# Allegro board BEAGLEV-AHEAD_V11_no_logo.brd
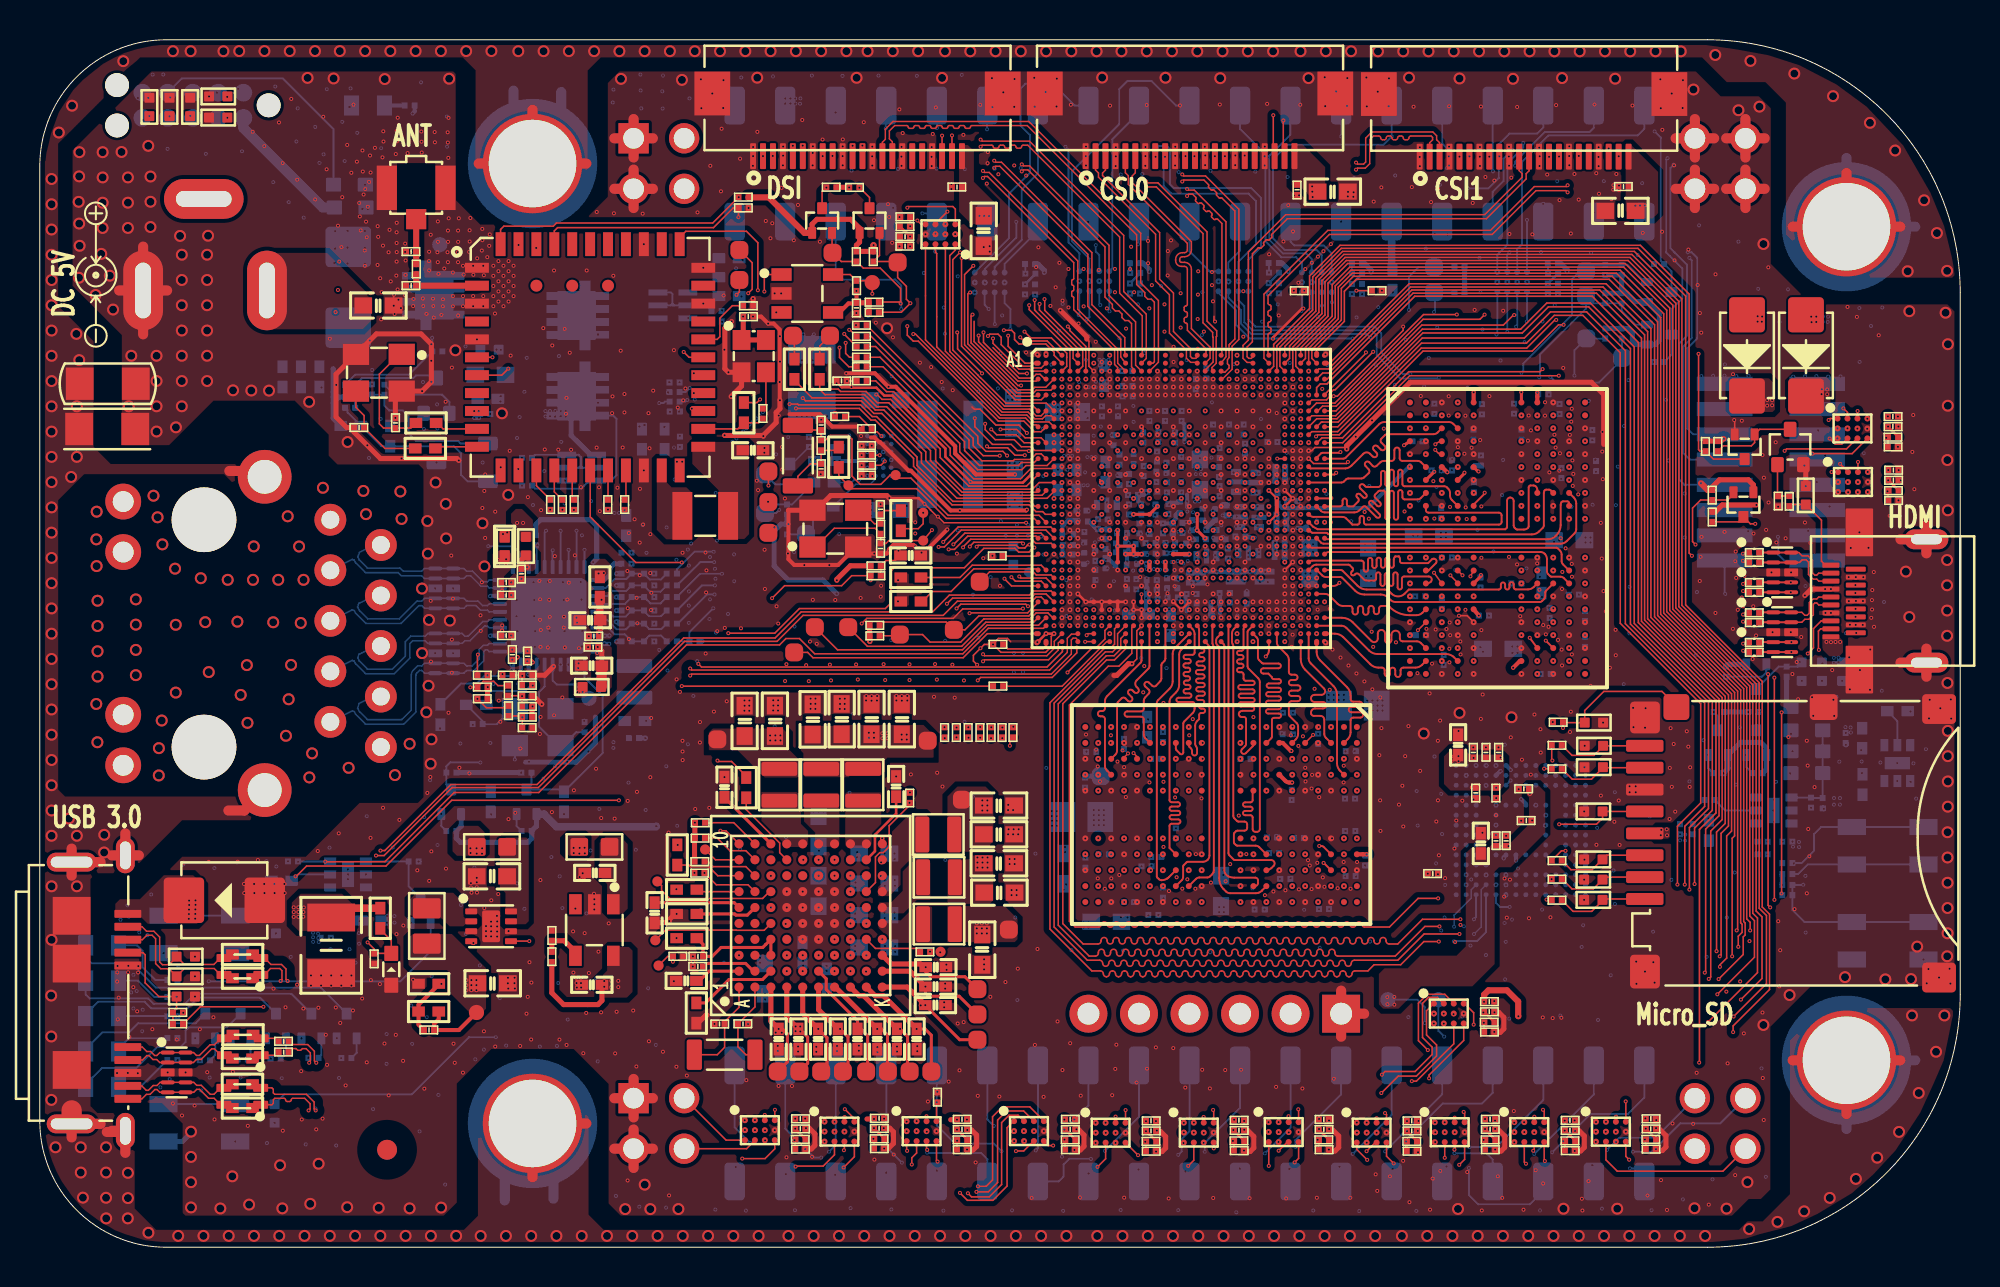
[diagram p0: board, top side]
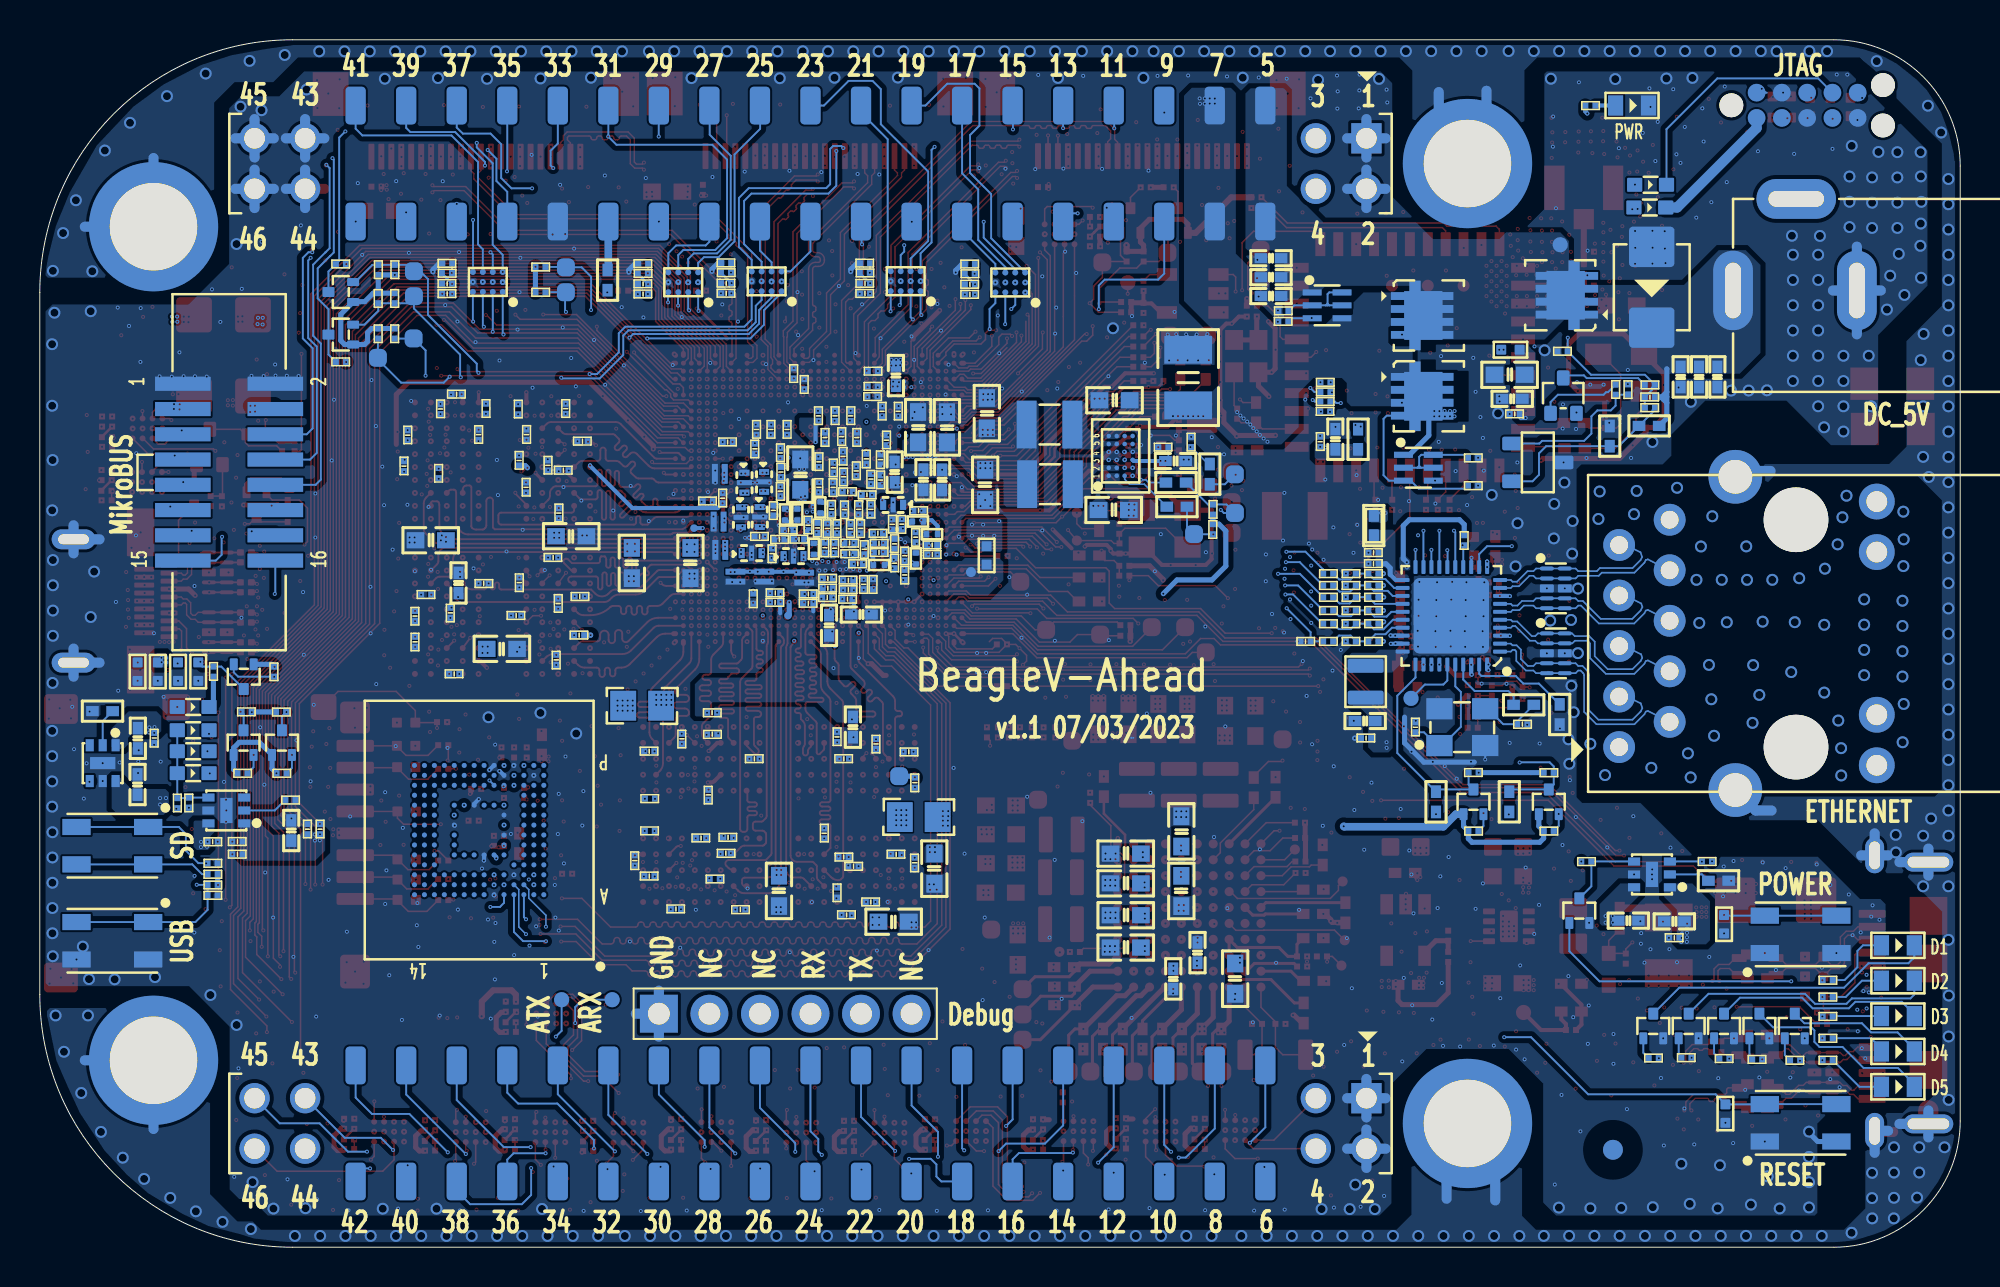
[diagram p1: board, bottom side, seen from below]

Outline 96.52 x 60.71 mm; copper layers: TOP, L2_GND, L3_SIG, L4_GND, L5_SIG, L6_PWR, L7_PWR, L8_PWR, L9_GND, BOTTOM. Coordinates in mm from the lower left corner of the outline.
Outline path: 0,54.36 0,6.35 arc(1.86,1.86) 6.35,0 83.82,0 arc(92.8,3.72) 96.52,12.7 96.52,48.01 arc(92.8,56.99) 83.82,60.71 6.35,60.71 arc(1.86,58.85) 0,54.36

## Design rules (mm)
constraint set DEFAULT: min track width 0.076, pair gap 0.127
net group EMMC0_CLK: nets EMMC0_CLK EMMC_CLK_S
net group GPIO4_08: nets GPIO4_08 N17026559
net group GPIO4_09: nets GPIO4_09 N17026498
net group GPIO4_10: nets GPIO4_10 N17026500
net group GPIO4_11: nets GPIO4_11 N17026502
net group GPIO4_12: nets GPIO4_12 N17026504
net group MDI0: nets MDI0+ MDI0-
net group MDI1: nets MDI1+ MDI1-
net group MDI2: nets MDI2+ MDI2-
net group MDI3: nets MDI3+ MDI3-
net group MICROB_DP: nets MICROB_DM MICROB_DP
net group MICROB_SSRXP: nets MICROB_SSRXM MICROB_SSRXP
net group MICROB_SSTXP: nets MICROB_SSTXM MICROB_SSTXP
net group MIPI_CSI2X2_B: nets MIPI_CSI2X2_B_CLKN MIPI_CSI2X2_B_CLKP
net group RGMII_RXCLK: nets RGMII_RXCLK RXC/PHYAD1
net group RGMII_RXD0: nets RGMII_RXD0 RXD0/RXDLY
net group RGMII_RXD1: nets RGMII_RXD1 RXD1/TXDLY
net group RGMII_RXD2: nets RGMII_RXD2 RXD2/PLLOFF
net group RGMII_RXD3: nets RGMII_RXD3 RXD3/PHYAD0
net group RGMII_RXDV: nets RGMII_RXDV RXCTL/PHYAD2
net group RGMII_TXCLK: nets RGMII_TXCLK TXC
net group RGMII_TXD0: nets RGMII_TXD0 TXD0
net group RGMII_TXD1: nets RGMII_TXD1 TXD1
net group RGMII_TXD2: nets RGMII_TXD2 TXD2
net group RGMII_TXD3: nets RGMII_TXD3 TXD3
net group RGMII_TXEN: nets RGMII_TXEN TXCTL
net group SDIO0_CLK: nets SD_CLK SDIO0_CLK
net group SDIO1_CLK: nets SDIO1_CLK SDIO1_CLK_R
net group SDIO1_CMD: nets N16794960 SDIO1_CMD
net group SDIO1_DAT0: nets N16794896 SDIO1_DAT0
net group SDIO1_DAT1: nets N16794893 SDIO1_DAT1
net group SDIO1_DAT2: nets N16794899 SDIO1_DAT2
net group SDIO1_DAT3: nets N16794902 SDIO1_DAT3
net group USB: nets USB_DM USB_DP
net group USB01: nets N16898160 N16898187
net group USB_RX: nets USB_RXM USB_RXP
net group USB_TX: nets USB_TXM USB_TXP
net group WIFI_XTAL_OUT: nets N16784971 WIFI_XTAL_OUT
net group DDR0_CA_CS_CK_CKE: nets EMI0_CA0 EMI0_CA1 EMI0_CA2 EMI0_CA3 EMI0_CA4 EMI0_CA5 EMI0_CK_C EMI0_CK_T EMI0_CKE0 EMI0_CKE1 EMI0_CS0 EMI0_CS1
net group DDR0_DQ0_DQS0_DMI0: nets EMI0_DMI0 EMI0_DQ0 EMI0_DQ1 EMI0_DQ2 EMI0_DQ3 EMI0_DQ4 EMI0_DQ5 EMI0_DQ6 EMI0_DQ7 EMI0_DQS0_C EMI0_DQS0_T
net group DDR0_DQ1_DQS1_DMI1: nets EMI0_DMI1 EMI0_DQ8 EMI0_DQ9 EMI0_DQ10 EMI0_DQ11 EMI0_DQ12 EMI0_DQ13 EMI0_DQ14 EMI0_DQ15 EMI0_DQS1_C EMI0_DQS1_T
net group DDR1_CA_CS_CK_CKE: nets EMI1_CA0 EMI1_CA1 EMI1_CA2 EMI1_CA3 EMI1_CA4 EMI1_CA5 EMI1_CK_C EMI1_CK_T EMI1_CKE0 EMI1_CKE1 EMI1_CS0 EMI1_CS1
net group DDR1_DQ0_DQS0_DMI0: nets EMI1_DMI0 EMI1_DQ0 EMI1_DQ1 EMI1_DQ2 EMI1_DQ3 EMI1_DQ4 EMI1_DQ5 EMI1_DQ6 EMI1_DQ7 EMI1_DQS0_C EMI1_DQS0_T
net group DDR1_DQ1_DQS1_DMI1: nets EMI1_DMI1 EMI1_DQ8 EMI1_DQ9 EMI1_DQ10 EMI1_DQ11 EMI1_DQ12 EMI1_DQ13 EMI1_DQ14 EMI1_DQ15 EMI1_DQS1_C EMI1_DQS1_T
net group DDR2_CA_CS_CK_CKE: nets EMI2_CA0 EMI2_CA1 EMI2_CA2 EMI2_CA3 EMI2_CA4 EMI2_CA5 EMI2_CK_C EMI2_CK_T EMI2_CKE0 EMI2_CKE1 EMI2_CS0 EMI2_CS1
net group DDR2_DQ0_DQS0_DMI0: nets EMI2_DMI0 EMI2_DQ0 EMI2_DQ1 EMI2_DQ2 EMI2_DQ3 EMI2_DQ4 EMI2_DQ5 EMI2_DQ6 EMI2_DQ7 EMI2_DQS0_C EMI2_DQS0_T
net group DDR2_DQ1_DQS1_DMI1: nets EMI2_DMI1 EMI2_DQ8 EMI2_DQ9 EMI2_DQ10 EMI2_DQ11 EMI2_DQ12 EMI2_DQ13 EMI2_DQ14 EMI2_DQ15 EMI2_DQS1_C EMI2_DQS1_T
net group DDR3_CA_CS_CK_CKE: nets EMI3_CA0 EMI3_CA1 EMI3_CA2 EMI3_CA3 EMI3_CA4 EMI3_CA5 EMI3_CK_C EMI3_CK_T EMI3_CKE0 EMI3_CKE1 EMI3_CS0 EMI3_CS1
net group DDR3_DQ0_DQS0_DMI0: nets EMI3_DMI0 EMI3_DQ0 EMI3_DQ1 EMI3_DQ2 EMI3_DQ3 EMI3_DQ4 EMI3_DQ5 EMI3_DQ6 EMI3_DQ7 EMI3_DQS0_C EMI3_DQS0_T
net group DDR3_DQ1_DQS1_DMI1: nets EMI3_DMI1 EMI3_DQ8 EMI3_DQ9 EMI3_DQ10 EMI3_DQ11 EMI3_DQ12 EMI3_DQ13 EMI3_DQ14 EMI3_DQ15 EMI3_DQS1_C EMI3_DQS1_T
net group EMMC: nets EMMC0/SD_RSTN
net group HDMI: nets HDMI_CLKN HDMI_CLKP HDMI_DATAN0 HDMI_DATAN1 HDMI_DATAN2 HDMI_DATAP0 HDMI_DATAP1 HDMI_DATAP2
net group MIPI_CSI2: nets MIPI_CSI2_DATAN0 MIPI_CSI2_DATAN1 MIPI_CSI2_DATAN2 MIPI_CSI2_DATAN3 MIPI_CSI2_DATAP0 MIPI_CSI2_DATAP1 MIPI_CSI2_DATAP2 MIPI_CSI2_DATAP3
net group MIPI_CSI2X2: nets MIPI_CSI2X2_A_CLKN MIPI_CSI2X2_A_CLKP MIPI_CSI2X2_A_DATAN0 MIPI_CSI2X2_A_DATAP0 MIPI_CSI2X2_B_DATAN0 MIPI_CSI2X2_B_DATAN1 MIPI_CSI2X2_B_DATAP0 MIPI_CSI2X2_B_DATAP1
net group MIPI_DSI1: nets MIPI_DSI1_CLKN MIPI_DSI1_CLKP MIPI_DSI1_DATAN0 MIPI_DSI1_DATAN1 MIPI_DSI1_DATAN2 MIPI_DSI1_DATAN3 MIPI_DSI1_DATAP0 MIPI_DSI1_DATAP1 MIPI_DSI1_DATAP2 MIPI_DSI1_DATAP3
net group SDIO0_CMD: nets SD_CMD SD_CMD_R SDIO0_CMD
net group SDIO0_DAT0: nets SD_DAT0 SD_DAT0_R SDIO0_DAT0
net group SDIO0_DAT1: nets SD_DAT1 SD_DAT1_R SDIO0_DAT1
net group SDIO0_DAT2: nets SD_DAT2 SD_DAT2_R SDIO0_DAT2
net group SDIO0_DAT3: nets SD_DAT3 SD_DAT3_R SDIO0_DAT3

## Placement (name value [footprint] x y rotation side)
C1  4.7uF  [C0402]  35.84 40.07 0 top
C2  4.7uF  [C0402]  22.52 42.66 0 bottom
C3  4.7uF  [C0402]  29.91 26.46 0 bottom
C4  100nF  [C0201]  22.39 41.89 0 bottom
C5  4.7uF  [C0402]  31.41 40.62 90 bottom
C6  100nF  [C0201]  32.17 40.5 90 bottom
C7  22pF  [C0201]  40.3 43.56 0 top
C8  10uF  [C0603]  22.72 18.65 180 top
C9  22pF  [C0201]  19.56 10.92 180 top
C10  22uF  [C0603]  22.76 13.27 0 top
C11  4.7uF  [C0402]  27.74 29.24 180 top
C12  100nF  [C0201]  27.81 30.17 180 top
C13  4.7uF  [C0402]  27.66 31.52 180 top
C14  100nF  [C0201]  35.61 46.79 0 top
C15  22pF  [C0201]  17.87 41.44 90 top
C16  18pF  [C0201]  16.05 41.21 180 top
C17  1pF  [C0201]  18.66 50.05 180 top
C18  1pF  [C0201]  18.66 48.34 180 top
C19  10uF  [C0603]  47.44 51.1 270 top
C20  100nF  [C0201]  27.85 30.72 180 top
C21  1uF  [C0201]  24.21 33.85 270 top
C22  100nF  [C0201]  23.75 29.79 90 top
C23  1uF  [C0201]  29.49 34.36 0 bottom
C24  100nF  [C0201]  29.49 34.92 0 bottom
C25  1uF  [C0201]  23.44 33.42 0 top
C26  100nF  [C0201]  23.44 30.76 0 top
C27  100nF  [C0201]  24.51 29.71 90 top
C28  100nF  [C0201]  23.44 32.79 0 top
C29  100nF  [C0201]  29.86 25.6 0 bottom
C30  1nF  [C1206]  3.42 43.41 180 top
C31  22pF  [C0201]  22.01 26.3 180 bottom
C32  22pF  [C0201]  27.39 26.14 90 bottom
C33  100nF  [C0201]  46.1 53.3 180 top
C34  1nF  [C0402]  43.77 34.78 0 top
C35  22pF  [C0201]  32.9 30.46 180 bottom
C36  10uF  [C0603]  79.44 52.11 180 top
C37  100nF  [C0201]  79.6 53.32 180 top
C38  100nF  [C0201]  53.56 34.39 90 bottom
C39  100nF  [C0201]  57.06 35.17 270 bottom
C40  100nF  [C0201]  53.19 36.35 270 bottom
C41  100nF  [C0201]  57.91 36.3 90 bottom
C42  100nF  [C0201]  56.94 32.67 180 bottom
C43  10uF  [C0603]  64.98 53.07 0 top
C44  100nF  [C0201]  55.93 32.59 180 bottom
C45  1uF  [C0201]  87.83 20.39 180 bottom
C46  1uF  [C0201]  86.59 20.39 0 bottom
C47  4.7uF  [C0402]  83.88 20.95 90 bottom
C48  100nF  [C0201]  83.07 21.02 90 bottom
C49  100nF  [C0201]  82.44 21.02 90 bottom
C50  100nF  [C0201]  73.19 20.43 90 top
C51  100nF  [C0201]  74.59 23.04 180 top
C52  100nF  [C0201]  73.7 20.43 90 top
C53  100nF  [C0201]  74.71 21.45 180 top
C54  4.7uF  [C0402]  72.43 20.3 90 top
C55  100nF  [C0201]  86.59 19.76 0 bottom
C56  100nF  [C0201]  72.17 22.84 270 top
C57  100nF  [C0201]  72.68 24.88 90 top
C58  100nF  [C0201]  72.05 24.88 90 top
C59  100nF  [C0201]  73.32 24.88 90 top
C60  4.7uF  [C0402]  71.28 25.26 90 top
C61  100nF  [C0201]  70.01 18.78 180 top
C62  100nF  [C0201]  63.19 53.16 270 top
C63  1uF  [C0402]  16.68 16.42 180 bottom
C64  1uF  [C0402]  91.59 25.59 270 bottom
C65  100nF  [C0201]  90.77 25.6 270 bottom
C66  100nF  [C0201]  12.26 10.35 180 top
C67  100nF  [C0201]  15.59 42.74 0 bottom
C68  100nF  [C0201]  12.26 9.81 180 top
C69  100uF  [C1210]  14.65 15.18 270 top
C70  1uF  [C0402]  91.61 23.26 90 bottom
C71  1uF  [C0402]  14.37 16.38 0 bottom
C72  100nF  [C0201]  14.37 15.56 0 bottom
C73  47uF  [C0603]  22.65 43.86 0 bottom
C74  100nF  [C0201]  68.96 5.85 0 top
C75  100nF  [C0201]  68.96 6.36 0 top
C76  100nF  [C0201]  76.91 5.88 0 top
C77  100nF  [C0201]  76.91 6.38 0 top
C78  100nF  [C0201]  64.54 5.93 0 top
C79  100nF  [C0201]  64.54 6.43 0 top
C80  100nF  [C0201]  55.85 5.85 0 top
C81  100nF  [C0201]  55.85 6.36 0 top
C82  100nF  [C0201]  42.18 5.98 0 top
C83  100nF  [C0201]  42.18 6.49 0 top
C84  100nF  [C0201]  93.14 41.26 0 top
C85  100nF  [C0201]  93.14 41.77 0 top
C86  100nF  [C0201]  72.85 11.84 0 top
C87  100nF  [C0201]  72.85 12.35 0 top
C88  100nF  [C0201]  55.05 48.46 0 bottom
C89  100nF  [C0201]  55.05 47.95 0 bottom
C90  100nF  [C0201]  93.16 38.57 0 top
C91  100nF  [C0201]  93.16 39.07 0 top
C92  100nF  [C0201]  76.05 48.44 0 bottom
C93  100nF  [C0201]  76.05 47.94 0 bottom
C94  100nF  [C0201]  41.05 47.23 270 top
C95  1uF  [C0402]  27.9 18.82 180 top
C96  1uF  [C0402]  27.75 13.2 180 top
C97  100nF  [C0201]  51.79 5.93 0 top
C98  100nF  [C0201]  51.79 6.43 0 top
C99  100nF  [C0201]  60.27 5.88 0 top
C100  100nF  [C0201]  60.27 6.38 0 top
C101  100nF  [C0201]  80.97 5.95 0 top
C102  100nF  [C0201]  80.97 6.46 0 top
C103  100nF  [C0201]  46.35 5.93 0 top
C104  100nF  [C0201]  46.35 6.43 0 top
C105  100nF  [C0201]  38.22 5.95 0 top
C106  100nF  [C0201]  38.22 6.46 0 top
C107  100nF  [C0201]  72.89 5.93 0 top
C108  100nF  [C0201]  72.89 6.43 0 top
C109  100nF  [C0201]  66.2 48.43 0 bottom
C110  100nF  [C0201]  66.2 47.92 0 bottom
C111  100nF  [C0201]  43.49 50.81 180 top
C112  100nF  [C0201]  43.49 50.33 180 top
C113  100nF  [C0201]  49.77 48.41 0 bottom
C114  100nF  [C0201]  49.77 47.9 0 bottom
C115  100nF  [C0201]  62.02 48.47 0 bottom
C116  100nF  [C0201]  62.02 47.96 0 bottom
C117  100pF  [C0402]  12.2 43.76 270 bottom
C118  220pF  [C0402]  13.13 43.76 270 bottom
C119  1nF  [C0402]  14.05 43.76 270 bottom
C120  220pF  [C0402]  34.64 49.73 0 bottom
C121  100pF  [C0402]  34.64 47.82 0 bottom
C122  1nF  [C0402]  34.64 48.77 0 bottom
C123  22uF  [C0603]  17.02 47.35 0 top
C169  22uF  [C0603]  76.87 35.54 0 bottom
C170  1uF  [C0201]  70.72 34.67 0 bottom
C171  1uF  [C0201]  72.41 33.42 270 bottom
C172  1uF  [C0201]  70.2 39.06 0 bottom
C173  1uF  [C0201]  69.38 32.72 180 bottom
C174  1uF  [C0201]  75.57 42.89 0 bottom
C176  100nF  [C0201]  72.58 31.76 0 bottom
C177  100nF  [C0201]  72.08 38.2 90 bottom
C178  10uF  [C0402]  75.48 33.4 90 bottom
C179  1uF  [C0201]  77.66 31.74 270 bottom
C180  1uF  [C0201]  78.22 39.27 90 bottom
C181  100nF  [C0201]  56.12 19.62 180 bottom
C257  1uF  [C0201]  74.21 33.37 180 bottom
C258  1uF  [C0201]  70.43 36.91 90 bottom
C259  1uF  [C0201]  75.69 28.82 0 bottom
C260  1uF  [C0201]  72.43 39.55 90 bottom
C261  1uF  [C0201]  70.98 39.31 90 bottom
C262  1uF  [C0201]  53.48 19.75 0 bottom
C267  22uF  [C0603]  53.61 16.37 180 bottom
C268  1uF  [C0201]  52.85 24.91 180 bottom
C269  1uF  [C0201]  65.88 18.66 0 bottom
C270  1uF  [C0201]  56.11 24.56 0 bottom
C271  1uF  [C0201]  64.25 25.56 270 bottom
C272  1uF  [C0201]  64.55 17 0 bottom
C273  1uF  [C0201]  65.89 24.94 0 bottom
C274  1uF  [C0201]  54.49 25.3 270 bottom
C275  100nF  [C0201]  54.75 17.36 0 bottom
C276  100nF  [C0201]  55.62 19.16 180 bottom
C277  100nF  [C0201]  62.73 26.87 180 bottom
C278  1uF  [C0201]  55.97 16.71 0 bottom
C281  1uF  [C0201]  62.92 22.74 270 bottom
C282  1uF  [C0201]  52.54 23.36 270 bottom
C283  1uF  [C0201]  61.31 16.98 180 bottom
C284  1uF  [C0201]  62.72 25.79 180 bottom
C285  100nF  [C0201]  66.61 19.44 270 bottom
C286  100nF  [C0201]  61.93 20.6 0 bottom
C287  10uF  [C0402]  55.65 26.15 270 bottom
C288  1uF  [C0201]  62.04 19.81 180 bottom
C289  1uF  [C0201]  72.06 40.85 90 bottom
C290  1uF  [C0201]  74.47 40.85 90 bottom
C333  22pF  [C0201]  39.27 41.34 270 top
C336  22pF  [C0201]  39.27 39.13 90 top
C337  18pF  [C0201]  42.25 35.13 90 top
C338  18pF  [C0201]  42.25 37.1 270 top
C373  1uF  [C0201]  59.27 38.98 270 bottom
C374  1uF  [C0201]  59.3 38.01 270 bottom
C375  1uF  [C0201]  54.75 38.62 270 bottom
C457  1uF  [C0201]  51.67 35.3 0 bottom
C458  10nF  [C0201]  51.66 34.83 0 bottom
C600  22uF  [C0603]  39.15 17.91 270 bottom
C601  47uF  [C0603]  41.8 26.55 90 top
C602  47uF  [C0603]  43.32 26.55 90 top
C603  22uF  [C0603]  41.94 15.07 0 bottom
C604  22uF  [C0603]  41.94 16.69 0 bottom
C605  22uF  [C0603]  41.94 18.29 0 bottom
C606  47uF  [C0603]  40.3 26.55 90 top
C607  22uF  [C0603]  36.44 13.5 270 bottom
C608  2.2uF  [C0402]  39.55 13.49 270 bottom
C609  22uF  [C0603]  39.15 20.91 90 bottom
C610  22uF  [C0603]  41.94 19.79 0 bottom
C611  2.2uF  [C0402]  38.33 14.81 90 bottom
C612  47uF  [C0603]  36.95 26.47 90 top
C613  47uF  [C0603]  35.42 26.46 90 top
C614  2.2uF  [C0402]  45.03 14.08 0 top
C615  2.2uF  [C0402]  45.02 13.1 0 top
C616  2.2uF  [C0402]  45.01 12.17 0 top
C617  2.2uF  [C0402]  44.07 10.47 270 top
C618  2.2uF  [C0402]  43.08 10.47 270 top
C619  2.2uF  [C0402]  42.09 10.47 270 top
C620  47uF  [C0603]  48.21 19.3 0 top
C621  47uF  [C0603]  48.23 17.83 0 top
C622  2.2uF  [C0402]  41.1 10.47 270 top
C623  2.2uF  [C0402]  40.11 10.47 270 top
C624  2.2uF  [C0402]  39.12 10.47 270 top
C625  2.2uF  [C0402]  30.9 16.82 270 top
C626  2.2uF  [C0402]  38.13 10.47 270 top
C627  2.2uF  [C0402]  37.14 10.47 270 top
C628  47uF  [C0603]  47.37 14.96 270 top
C629  47uF  [C0603]  48.92 41.93 90 bottom
C630  47uF  [C0603]  49.01 38.33 270 bottom
C631  100uF  [C1210]  38.8 43.72 90 bottom
C632  22uF  [C0603]  42.55 37.07 0 bottom
C633  22uF  [C0603]  42.5 42.58 0 bottom
C634  22pF  [C0201]  34.16 11.23 0 top
C638  1uF  [C0402]  39.44 39.53 180 bottom
C639  22pF  [C0201]  35.34 11.23 180 top
C640  1uF  [C0201]  33.08 14.62 180 top
C641  220nF  [C0201]  33.07 14.11 180 top
C642  470nF  [C0402]  32.49 13.39 180 top
C643  47nF  [C0402]  34.41 23.13 90 top
C644  470nF  [C0402]  43.04 23.16 90 top
C673  47uF  [C0603]  38.84 26.54 90 top
C687  47uF  [C0603]  48.21 22.21 0 top
C698  47uF  [C0603]  48.21 20.76 0 top
C1000  22uF  [C0603]  73.3 30.08 180 bottom
C1001  1uF  [C0201]  70.47 32.36 90 bottom
C1002  1uF  [C0201]  69.41 30.77 0 bottom
C1003  1uF  [C0201]  75.89 31.89 270 bottom
C1004  1uF  [C0201]  70.56 29.53 270 bottom
C1005  1uF  [C0201]  77.66 30.44 270 bottom
C1006  1uF  [C0201]  76.38 42.14 90 bottom
C1007  1uF  [C0201]  78.03 40.83 90 bottom
C1008  100nF  [C0201]  69.24 40.52 0 bottom
C1009  100nF  [C0201]  70.09 42.16 90 bottom
C1010  22uF  [C0603]  59.37 17.91 270 bottom
C1011  1uF  [C0201]  60.6 24.56 0 bottom
C1012  1uF  [C0201]  57.1 20.81 90 bottom
C1013  1uF  [C0201]  56.45 25.66 90 bottom
C1014  1uF  [C0201]  52.55 19.33 270 bottom
C1015  1uF  [C0201]  63.29 20.57 0 bottom
C1020  1uF  [C0201]  59.3 39.93 90 bottom
C1021  1uF  [C0201]  59.65 37.04 270 bottom
C1023  1uF  [C0201]  56.72 37.11 270 bottom
C1024  1uF  [C0201]  56.15 39.76 90 bottom
C1026  100nF  [C0201]  55.82 35.41 180 bottom
C1027  100nF  [C0201]  57.36 38.21 270 bottom
C1028  1uF  [C0201]  54.27 38.57 90 bottom
C1029  1uF  [C0201]  54.75 37.1 90 bottom
C1030  1uF  [C0201]  56.07 37.09 270 bottom
C1031  1uF  [C0201]  55.49 39.03 90 bottom
C1034  10uF  [C0402]  53.55 38.97 90 bottom
C1035  10uF  [C0402]  51.17 38.58 90 bottom
C1036  10uF  [C0402]  52.11 38.58 90 bottom
C1037  47uF  [C0603]  58.3 38.85 90 bottom
C1038  47uF  [C0603]  52.38 41.23 90 bottom
C1039  47uF  [C0603]  50.93 41.22 90 bottom
C1040  1uF  [C0201]  56.65 38.2 270 bottom
C1041  1uF  [C0201]  57.36 39.49 90 bottom
C1042  1uF  [C0201]  56.63 39.19 270 bottom
C1043  1uF  [C0201]  56.12 38.74 270 bottom
C1044  1uF  [C0201]  54.27 39.6 270 bottom
C1045  1uF  [C0201]  54.98 39.64 270 bottom
C1046  1uF  [C0201]  55.36 37.1 270 bottom
C1047  1uF  [C0201]  54.95 37.83 180 bottom
C1048  1uF  [C0201]  55.91 37.98 0 bottom
C1051  100nF  [C0201]  57.39 41.8 90 bottom
C1052  1uF  [C0201]  56.55 41.8 90 bottom
C1053  1uF  [C0201]  55.76 41.8 90 bottom
C1055  1uF  [C0201]  55.46 40.7 90 bottom
C1056  1uF  [C0201]  57.06 40.7 90 bottom
C1057  100nF  [C0201]  56.22 40.75 90 bottom
C1059  1uF  [C0201]  55.08 35.09 270 bottom
C1060  1uF  [C0201]  55.41 34.36 0 bottom
C1062  100nF  [C0201]  55.78 36.12 90 bottom
C1066  1uF  [C0201]  55.11 33.33 270 bottom
C1067  10uF  [C0402]  53.49 43.82 90 bottom
C1068  1uF  [C0201]  61.94 40.48 0 bottom
C1069  1uF  [C0201]  54.19 42.03 90 bottom
C1070  1uF  [C0201]  60.5 41.11 90 bottom
C1071  1uF  [C0201]  53.38 42.03 90 bottom
C1072  1uF  [C0201]  59.78 41.11 90 bottom
C1073  100nF  [C0201]  53.97 40.58 90 bottom
C1074  100nF  [C0201]  58.97 41.11 90 bottom
C1075  10uF  [C0402]  56.85 31.27 270 bottom
C1076  1uF  [C0201]  56.91 33.63 0 bottom
C1077  1uF  [C0201]  56.91 33.13 0 bottom
C1083  1uF  [C0201]  52.36 37.03 180 bottom
C1084  100nF  [C0201]  53.05 33.8 270 bottom
C1085  10uF  [C0402]  55.23 31.81 180 bottom
C1086  1uF  [C0201]  55.89 33.05 0 bottom
C1087  1uF  [C0201]  55.89 33.54 0 bottom
C1091  1uF  [C0201]  54.4 35.9 180 bottom
C1092  1uF  [C0201]  54.34 34.93 180 bottom
C1093  100nF  [C0201]  54.34 35.39 180 bottom
C1095  1uF  [C0201]  53.57 35.36 90 bottom
C1097  1uF  [C0201]  56.94 36.14 270 bottom
C1098  100nF  [C0201]  56.45 36.14 270 bottom
C1100  1uF  [C0201]  60.58 40.15 270 bottom
C1101  1uF  [C0201]  57.43 36.17 270 bottom
C1103  1uF  [C0201]  55.26 36.14 270 bottom
C1106  1uF  [C0201]  55.83 34.87 180 bottom
C1109  100nF  [C0201]  58.89 36.06 0 bottom
C1110  1uF  [C0201]  52.5 35.7 270 bottom
C1111  1uF  [C0201]  53.67 36.34 90 bottom
C1114  1uF  [C0201]  53.05 34.77 270 bottom
C1115  4.3uF  [EMIFIL_0402_3P]  61.28 36.7 270 bottom
C1116  4.3uF  [EMIFIL_0402_3P]  60.74 34.9 180 bottom
C1117  4.3uF  [EMIFIL_0402_3P]  58.64 34.75 180 bottom
C1118  4.3uF  [EMIFIL_0402_3P]  61.11 38.44 270 bottom
C1119  22uF  [C0603]  69.81 35.75 180 bottom
C1120  22uF  [C0603]  51.56 19.03 270 bottom
C1122  1uF  [C0204]  60.11 33.71 270 bottom
C1123  1uF  [C0204]  61.56 33.71 270 bottom
C1124  1uF  [C0204]  58.1 33.66 270 bottom
C1125  1uF  [C0204]  62.34 38.88 0 bottom
C1127  1uF  [C0204]  62.32 35.06 0 bottom
C1128  1uF  [C0204]  62.4 36.48 0 bottom
C1129  22uF  [C0603]  63.82 34.4 270 bottom
C1130  22uF  [C0603]  66.76 34.4 270 bottom
C1133  4.3uF  [EMIFIL_0402_3P]  60.12 38.48 270 bottom
C1134  4.3uF  [EMIFIL_0402_3P]  60.34 36.71 270 bottom
C1135  1uF  [C0201]  59.71 34.88 270 bottom
C1136  1uF  [C0201]  58.36 35.59 0 bottom
C1137  1uF  [C0201]  60.34 35.73 0 bottom
C1138  1uF  [C0201]  59.35 35.59 180 bottom
C1140  100nF  [C0201]  59.56 32.42 0 bottom
C1141  1uF  [C0201]  57.9 32.37 0 bottom
C1142  1uF  [C0201]  59.56 32.89 0 bottom
C1144  1uF  [C0201]  62.2 37.66 90 bottom
C1147  1uF  [C0201]  57.89 32.84 0 bottom
C1150  1uF  [C0201]  56.57 35.14 90 bottom
C1151  22nF  [EMIFIL_0402_3P]  53.63 37.32 0 bottom
D1  TPD4E05U06DQAR  [USON10_0D5_2D5X1X0D5MM]  20.32 33.12 270 bottom
D2  TPD4E05U06DQAR  [USON10_0D5_2D5X1X0D5MM]  20.32 29.86 270 bottom
D3  RB520S30T1G  [SOD_523]  88.81 27.16 180 bottom
D4  TPD4E05U06DQAR  [USON10_0D5_2D5X1X0D5MM]  87.57 33.93 270 top
D5  TPD4E05U06DQAR  [USON10_0D5_2D5X1X0D5MM]  87.57 30.92 270 top
D6  ESDPSA0402V05  [D0402]  88.56 28.94 90 bottom
D7  ESDPSA0402V05  [D0402]  89.57 28.94 90 bottom
D8  ESDPSA0402V05  [D0402]  91.6 28.94 90 bottom
D9  RB520S30T1G  [SOD_523]  88.81 23.83 180 bottom
D10  ESDPSA0402V05  [D0402]  90.59 28.94 90 bottom
D11  ESDPSA0402V05  [D0402]  88.76 37.8 270 top
D12  TPD4E02B04DQAR  [USON10_0D5_2D5X1X0D5MM]  6.88 8.79 270 top
D13  RB520S30T1G  [SOD_523]  88.81 25.99 180 bottom
D14  TPD1E1B04DPYR  [D0402]  78.11 26.38 180 top
D15  TPD1E1B04DPYR  [D0402]  78.08 17.46 0 top
D16  TPD1E1B04DPYR  [D0402]  78.08 18.48 0 top
D17  TPD1E1B04DPYR  [D0402]  78.08 19.5 0 top
D18  TPD1E1B04DPYR  [D0402]  78.08 21.91 0 top
D19  ESDPSA0402V05  [D0402]  7.34 14.61 180 top
D20  ESDPSA0402V05  [D0402]  7.34 13.62 180 top
D21  ESDPSA0402V05  [D0402]  7.34 12.6 180 top
D22  SMBJ5.0CA-TR  [DO_214AA_SMB]  9.28 17.44 180 top
D23  MM5Z3V3T1G  [SOD_523]  17.67 13.97 90 top
D24  B130L-13-F  [DO_214AC_SMA]  85.8 44.84 270 top
D25  SMBJ24CA  [DO_214AA_SMB]  15.5 48.26 270 bottom
D26  TPD1E1B04DPYR  [D0402]  78.1 24.14 0 top
D27  TPD1E1B04DPYR  [D0402]  78.11 25.21 0 top
D28  B130L-13-F  [DO_214AC_SMA]  88.77 44.84 270 top
D29  TPD1E1B04DPY  [D0402]  8.97 57.86 0 top
D30  TPD1E1B04DPY  [D0402]  7.56 57.33 270 top
D31  TPD1E1B04DPY  [D0402]  5.51 57.33 270 top
D32  RB520S30T1G  [SOD_523]  15.56 53.42 180 bottom
D33  TPD1E1B04DPY  [D0402]  8.97 56.8 0 top
D34  TPD1E1B04DPY  [D0402]  6.52 57.33 270 top
D35  RB520S30T1G  [SOD_523]  15.6 52.27 180 bottom
D36  ESDPSA0402V05  [D0402]  11.8 6.72 90 bottom
D37  ESDPSA0402V05  [D0402]  11.87 16.24 90 bottom
D38  RB520S30T1G  [SOD_523]  88.81 24.94 180 bottom
FB1  120R  [L0603]  22.73 20.13 0 top
FB2  120R  [L0402]  27.74 28.17 0 top
FB3  120R  [L0402]  24.43 35.25 90 top
FB4  120R  [L0402]  23.37 35.23 90 top
FB5  600R  [L0201]  52.49 34.63 270 bottom
FB6  600R  [L0201]  52.39 36.48 180 bottom
FB7  600R  [L0201]  51.68 35.85 180 bottom
FB8  600R  [L0201]  54.34 34.3 180 bottom
FB9  600R  [L0201]  57.29 37.19 270 bottom
FB10  600R  [L0201]  58.45 36.84 90 bottom
FB11  600R  [L0201]  59.07 36.84 90 bottom
FB12  600R  [L0201]  57.62 35.11 90 bottom
FB13  120R  [L0402]  48.93 34.78 270 bottom
FB14  120R  [L0402]  29.47 36.28 270 bottom
FB15  120R  [L0402]  22.6 45.12 180 bottom
FB16  120R  [L0603]  27.87 20.13 0 top
J1  10118241-001RLF  [HDMI23P_0D4_7D5X6D5X2D9MM]  90.02 32.49 180 top
J2  U.FL-R-SMT-1(10)  [U-FL3P-SMD-2_6X2_6X1_0MM]  18.92 53.26 270 top
J3  FPC 22P 0.5mm  [FPC22_0D5_15_4X5_25X2MM_0D5_DX_NPWB]  41.1 55.16 180 top
J4  FPC 22P 0.5mm  [FPC22_0D5_15_4X5_25X2MM_0D5_DX_NPWB]  74.6 55.13 180 top
J5  FPC 22P 0.5mm  [FPC22_0D5_15_4X5_25X2MM_0D5_DX_NPWB]  57.81 55.16 180 top
J6  Micro USB 3.0 Type B  [USB_MTCONN_UBF30-0101]  1.6 15.46 270 top
J7  Header 2x8 1.27mm  [HEADER2X8_SMD_1D27]  87.01 38.97 90 bottom
J8  DC-005  [DC_JACK_DC_005_14_2X11X9MM]  8.24 47.75 0 bottom
J9  TC2050-IDC  [CONNECT10_1D27_12_4X6_7MM]  7.69 57.41 180 bottom
J10  Header 1x6 2.54mm  [HEADER6P_2D54_DIP]  65.41 11.74 90 bottom
J14  LPJG0933H11NL  [RJ45_18P_LPJG0801HBNL]  8.25 30.86 90 bottom
J15  YL004-030-001  [MICRO_SD_15X14_3X1_8MM]  80.68 26.31 270 top
L1  4.7uH  [L2520]  33.45 36.77 0 top
L2  0.47uH  [L0805]  19.45 16.15 270 top
L3  2.2uH  [L2016]  29.88 28.43 270 bottom
L4  90R  [L2012]  10.18 14.11 180 top
L5  90R  [L2012]  10.2 10.08 180 top
L6  90R  [L2012]  10.18 7.59 180 top
L7  90R  [L4P_0_85X0_65MM]  86.16 30.16 270 top
L8  90R  [L4P_0_85X0_65MM]  86.16 31.66 270 top
L9  90R  [L4P_0_85X0_65MM]  86.16 33.18 270 top
L10  90R  [L4P_0_85X0_65MM]  86.16 34.68 270 top
L36  1uH  [L2016]  41.38 23.25 90 top
L37  1uH  [L2016]  39.28 23.25 90 top
L38  1uH  [L2016]  37.17 23.25 90 top
L39  1uH  [L2016]  45.19 18.6 0 top
L40  1uH  [L2016]  45.19 16.24 0 top
L41  0.16uH  [L2520]  45.75 38.36 0 bottom
L42  0.16uH  [L2520]  45.77 41.36 0 bottom
L43  1uH  [L2016]  45.16 20.75 0 top
LED1  Blue  [LED0603]  3.13 15.18 180 bottom
LED2  Blue  [LED0603]  3.13 13.4 180 bottom
LED3  Blue  [LED0603]  3.13 11.62 180 bottom
LED4  Blue  [LED0603]  3.13 9.84 180 bottom
LED5  Blue  [LED0603]  3.13 8.07 180 bottom
LED6  Green  [LED0603]  16.5 57.4 180 bottom
MH1  SMD Stud M3  [PTH_4_45MM_6D5]  24.77 54.48 180 bottom
MH2  SMD Stud M3  [PTH_4_45MM_6D5]  24.77 6.22 180 bottom
MH3  SMD Stud M3  [PTH_4_45MM_6D5]  90.81 9.4 180 bottom
MH4  SMD Stud M3  [PTH_4_45MM_6D5]  90.81 51.31 180 bottom
NOREF  -  []  6.39 0.01 90 top
NOREF#2  U*  [unnamed#2]  17.45 4.9 0 top
NOREF#3  -  []  0 54.36 0 top
NOREF#4  U*  [unnamed#2]  17.45 4.9 180 bottom
OSC1  32.768kHz  [X4-SMD-2_5X2_0X1_0MM]  35.88 44.8 270 top
P8  Header 2x23 2.54mm  [HEADER2X23P_2D54_SMD_PTH]  57.78 6.22 0 bottom
P9  Header 2x23 2.54mm  [HEADER2X23P_2D54_SMD_PTH]  57.78 54.48 0 bottom
Q1  DMG1012T-7  [SOT_523]  20.68 22.39 0 bottom
Q2  DMG1012T-7  [SOT_523]  24.46 22.39 0 bottom
Q3  DMG1012T-7  [SOT_523]  41.7 51.62 180 top
Q4  CJ2101  [SOT323]  19.95 42.82 180 bottom
Q7  DMG1012T-7  [SOT_523]  39.32 51.62 180 top
Q8  DMG1012T-7  [SOT_523]  84.35 25.37 0 bottom
Q9  DMG1012T-7  [SOT_523]  86.28 25.37 0 bottom
Q10  DMG1012T-7  [SOT_523]  86.27 28.69 180 bottom
Q11  BC817W  [SOT323]  87.97 40.23 0 top
Q12  DMG1012T-7  [SOT_523]  85.69 40.25 0 top
Q13  DMG1012T-7  [SOT_523]  19.14 16.92 0 bottom
Q14  DMG1012T-7  [SOT_523]  81.39 48.02 270 bottom
Q15  RQ3E120ATTB  [DFN08_SON08_0D66_3X3MM]  20.1 47.86 0 bottom
Q16  DMG1012T-7  [SOT_523]  81.39 45.88 270 bottom
Q17  DMG1012T-7  [SOT_523]  15.43 11.12 0 bottom
Q18  DMG1012T-7  [SOT_523]  13.65 11.12 0 bottom
Q19  DMG1012T-7  [SOT_523]  11.87 11.12 0 bottom
Q20  DMG1012T-7  [SOT_523]  8.31 11.12 0 bottom
Q21  RQ3E120ATTB  [DFN08_SON08_0D66_3X3MM]  26.71 46.85 180 bottom
Q22  RQ3E120ATTB  [DFN08_SON08_0D66_3X3MM]  26.71 42.78 180 bottom
Q23  BCM857BS-7-F  [SMINI6-F3-B]  31.82 47.35 90 bottom
Q24  BCM857BS-7-F  [SMINI6-F3-B]  27.23 39.19 90 bottom
Q26  DMG1012T-7  [SOT_523]  10.09 11.12 0 bottom
Q27  DMG1012T-7  [SOT_523]  85.63 37.34 0 top
R1  0R  [R0402]  30.26 40.62 90 bottom
R2  0R  [R0402]  35.39 41.96 90 top
R3  240R  [R0201]  72.48 42.13 90 bottom
R4  240R  [R0201]  74.1 42.16 90 bottom
R5  33R  [R0201]  36.34 41.91 90 top
R6  0R  [R0402]  19.38 40.16 180 top
R7  100R  [R0402]  19.41 41.44 180 top
R8  240R  [R0201]  65.85 22.55 0 bottom
R9  240R  [R0201]  65.86 20.93 0 bottom
R10  10K  [R0201]  77.1 32.81 0 bottom
R11  120R  [R0201]  62.95 37.51 0 bottom
R12  240R  [R0201]  76.47 38.92 270 bottom
R13  0R  [R0805]  52.35 21.63 0 bottom
R14  0R  [R0805]  66.24 27.23 180 bottom
R15  10K  [R0201]  56.45 17.83 270 bottom
R16  120R  [R0201]  60.66 32.61 270 bottom
R17  240R  [R0201]  62.6 18.52 180 bottom
R18  4.7K  [R0201]  24.5 28.76 180 top
R19  4.7K  [R0201]  24.5 27.72 180 top
R20  47K  [R0201]  83.93 22.49 180 bottom
R21  10K  [R0201]  76.3 26.4 0 top
R22  4.7K  [R0201]  24.5 26.12 180 top
R23  4.7K  [R0201]  24.49 28.26 0 top
R24  4.7K  [R0201]  24.49 27.19 0 top
R25  200R  [R0201]  54.64 33.33 270 bottom
R26  4.7K  [R0201]  24.49 26.66 0 top
R27  4.7K  [R0201]  30.63 33.87 180 bottom
R28  4.7K  [R0201]  30.63 30.46 180 bottom
R29  4.7K  [R0201]  30.63 31.35 180 bottom
R30  4.7K  [R0201]  29.5 33.87 180 bottom
R31  4.7K  [R0201]  29.5 30.46 180 bottom
R32  4.7K  [R0201]  29.5 31.35 180 bottom
R33  4.7K  [R0201]  29.5 33.28 180 bottom
R34  4.7K  [R0201]  29.5 32.68 180 bottom
R35  120R  [R0201]  42.01 33.76 0 top
R36  4.7K  [R0201]  29.5 32.01 180 bottom
R37  33R  [R0201]  31.91 42.02 0 bottom
R38  10K  [R0201]  35.37 52.25 180 top
R39  10K  [R0201]  35.37 52.79 180 top
R40  10K  [R0201]  35.6 47.34 0 top
R41  4.7K  [R0201]  41.96 30.74 0 top
R42  4.7K  [R0201]  41.96 31.27 0 top
R43  4.7K  [R0201]  37.56 36.1 270 bottom
R44  100K  [R0201]  42.01 34.26 0 top
R45  4.7K  [R0201]  37.56 37.09 90 bottom
R46  4.7K  [R0201]  30.63 33.28 180 bottom
R47  4.7K  [R0201]  30.63 32.68 180 bottom
R48  4.7K  [R0201]  30.63 32.01 180 bottom
R49  0R  [R0201]  31.77 33.87 180 bottom
R50  1M  [R0201]  39.27 40.32 270 top
R51  470K  [R0201]  42.27 36.12 270 top
R52  0R  [R0201]  31.77 33.28 180 bottom
R53  33R  [R0201]  28.54 37.33 90 top
R54  33R  [R0201]  29.39 37.33 90 top
R55  33R  [R0201]  25.67 37.33 90 top
R56  0R  [R0201]  18.92 49.17 90 top
R57  4.7K  [R0201]  78.68 45.94 270 bottom
R58  4.7K  [R0201]  79.51 45.94 270 bottom
R59  4.7K  [R0201]  78.68 49.14 90 bottom
R60  4.7K  [R0201]  78.68 47.71 270 bottom
R61  0R  [R0201]  31.77 32.68 180 bottom
R62  0R  [R0201]  31.77 32.01 180 bottom
R63  4.7K  [R0201]  41.92 47.01 0 top
R64  4.7K  [R0201]  41.92 47.52 0 top
R65  4.7K  [R0201]  71.35 49.29 180 bottom
R66  4.7K  [R0201]  71.35 48.02 180 bottom
R67  33R  [R0201]  31.91 42.51 0 bottom
R68  33R  [R0201]  31.9 42.99 0 bottom
R69  33R  [R0201]  31.9 43.48 0 bottom
R70  33R  [R0201]  26.26 37.33 90 top
R71  33R  [R0201]  26.85 37.33 90 top
R72  33R  [R0201]  47.26 25.89 270 top
R73  33R  [R0201]  46.66 25.89 270 top
R74  0R  [R0201]  31.77 30.46 180 bottom
R75  33R  [R0201]  46.07 25.89 270 top
R76  33R  [R0201]  45.48 25.89 270 top
R77  33R  [R0201]  48.37 25.89 270 top
R78  0R  [R0201]  31.77 31.35 180 bottom
R79  33R  [R0201]  48.92 25.89 270 top
R80  27R  [R0201]  41.31 44.74 180 top
R81  27R  [R0201]  41.31 46.35 180 top
R82  27R  [R0201]  41.31 45.79 180 top
R83  33R  [R0201]  47.82 25.89 270 top
R84  33R  [R0201]  76.24 17.45 0 top
R85  33R  [R0201]  76.24 18.51 0 top
R86  33R  [R0201]  76.24 19.44 0 top
R87  10K  [R0201]  41.9 49.81 270 top
R88  33R  [R0201]  76.24 24.06 0 top
R89  27R  [R0201]  41.31 44.27 180 top
R90  33R  [R0201]  76.24 25.24 0 top
R91  10K  [R0201]  40.94 53.29 0 top
R92  10K  [R0201]  41.04 49.81 270 top
R93  10K  [R0201]  39.78 53.29 180 top
R94  1.62K  [R0201]  87.79 28.94 90 bottom
R95  27R  [R0201]  41.31 45.28 180 top
R96  27R  [R0201]  41.31 43.56 180 top
R97  10K  [R0201]  20.68 20.93 180 bottom
R98  10K  [R0201]  20.68 23.86 180 bottom
R99  10K  [R0201]  24.47 20.93 180 bottom
R100  10K  [R0201]  24.46 23.86 0 bottom
R101  560K  [R0402]  19.54 11.85 180 top
R102  124K  [R0402]  19.54 13.25 180 top
R103  0R  [R0402]  28.15 33.2 90 top
R104  2.49K  [R0402]  20.13 26.79 270 bottom
R105  1.62K  [R0201]  24.93 35.54 270 bottom
R106  0R  [R0201]  22.25 28.75 180 top
R107  1K  [R0201]  22.25 27.57 180 top
R108  0R  [R0201]  23.55 26.96 90 top
R109  1K  [R0201]  23.54 27.98 90 top
R110  1K  [R0201]  23.51 28.76 180 top
R111  1K  [R0201]  22.25 28.16 180 top
R112  1M  [R1206]  3.39 41.14 180 top
R113  10K  [R0201]  86.33 23.83 180 bottom
R114  1.62K  [R0201]  84.39 26.91 180 bottom
R115  100K  [R0201]  87.37 37.5 90 top
R116  30K  [R0402]  12.15 18.42 180 bottom
R117  10K  [R0201]  84.37 23.83 180 bottom
R118  10K  [R0201]  84.75 28.94 270 bottom
R119  100K  [R0201]  87.93 37.51 270 top
R120  1.62K  [R0201]  86.13 26.91 0 bottom
R121  1K  [R0201]  83.72 40.28 270 top
R122  100K  [R0201]  84.34 40.28 270 top
R123  1K  [R0201]  6.95 11.22 180 top
R124  0R  [R0402]  10.19 8.19 180 top
R125  0R  [R0402]  10.19 14.72 180 top
R126  0R  [R0402]  10.19 13.52 180 top
R127  0R  [R0402]  10.21 10.68 180 top
R128  0R  [R0402]  10.19 9.49 180 top
R129  10K  [R0201]  6.95 11.8 180 top
R130  0R  [R0402]  10.19 7 180 top
R131  30K  [R0402]  17.11 16.54 90 top
R132  10K  [R0201]  18.79 19.39 180 bottom
R133  10K  [R0201]  12.73 19.4 180 bottom
R134  10K  [R0201]  68.97 5.32 180 top
R135  1M  [R0201]  68.96 4.83 0 top
R136  200K  [R0402]  93.37 26.95 0 bottom
R137  10K  [R0201]  76.92 5.34 180 top
R138  1M  [R0201]  76.91 4.86 0 top
R139  10K  [R0201]  64.55 5.39 180 top
R140  1M  [R0201]  64.54 4.91 0 top
R141  10K  [R0201]  55.86 5.32 180 top
R142  1M  [R0201]  55.85 4.83 0 top
R143  2.7K  [R0402]  15.64 41.29 0 bottom
R144  1K  [R0201]  15.6 43.36 180 bottom
R145  10K  [R0201]  19.98 45.04 0 bottom
R146  10K  [R0201]  16.69 43.13 270 bottom
R147  10K  [R0201]  42.19 5.44 180 top
R148  10K  [R0201]  89.61 22.32 90 bottom
R149  10K  [R0201]  73.19 22.84 270 top
R150  33R  [R0201]  48.17 28.21 180 top
R151  47K  [R0201]  34.01 47.07 0 bottom
R152  47K  [R0201]  34.02 46.55 0 bottom
R153  47K  [R0201]  24.48 39.69 180 bottom
R154  47K  [R0201]  24.48 38.29 180 bottom
R155  2.2K  [R0402]  17.61 40.78 90 bottom
R156  0R  [R0201]  86.16 34.93 0 top
R157  1M  [R0201]  42.18 4.96 0 top
R158  10K  [R0201]  93.15 40.73 180 top
R159  1M  [R0201]  93.14 40.24 0 top
R160  10K  [R0201]  72.86 11.31 180 top
R161  1M  [R0201]  72.85 10.83 0 top
R162  10K  [R0201]  55.06 48.99 180 bottom
R163  1M  [R0201]  55.05 49.47 0 bottom
R164  10K  [R0201]  93.17 38.03 180 top
R165  1M  [R0201]  93.16 37.55 0 top
R166  10K  [R0201]  76.06 48.98 180 bottom
R167  1M  [R0201]  76.05 49.46 0 bottom
R168  10K  [R0201]  79.51 49.14 90 bottom
R169  10K  [R0201]  81.39 49.43 0 bottom
R170  10K  [R0201]  79.51 47.71 270 bottom
R171  10K  [R0201]  81.39 44.51 0 bottom
R172  100K  [R0201]  67.2 48.09 0 top
R173  100K  [R0201]  41.56 40.3 180 top
R174  100K  [R0201]  48.16 30.31 180 top
R175  100K  [R0201]  41.56 41.14 180 top
R176  100K  [R0201]  45.11 7.53 90 top
R177  100K  [R0201]  87.83 17.7 180 bottom
R178  100K  [R0201]  63.29 48.09 0 top
R179  100K  [R0201]  87.83 19.31 180 bottom
R180  10K  [R0201]  41.04 48.33 90 top
R181  100K  [R0201]  41.56 38.82 180 top
R182  100K  [R0201]  41.56 39.82 180 top
R183  100K  [R0201]  48.13 34.75 180 top
R184  100K  [R0201]  87.83 18.22 180 bottom
R185  1K  [R0201]  87.83 18.76 180 bottom
R186  1K  [R0201]  6.66 13.43 180 bottom
R187  1K  [R0201]  6.66 12.58 180 bottom
R188  1K  [R0201]  6.66 11.61 180 bottom
R189  1K  [R0201]  6.66 10.51 180 bottom
R190  1K  [R0201]  6.66 9.41 180 bottom
R191  1K  [R0201]  15.4 9.51 0 bottom
R192  1K  [R0201]  13.76 9.52 0 bottom
R193  1K  [R0201]  11.85 9.48 0 bottom
R194  1K  [R0201]  8.3 9.4 0 bottom
R195  1K  [R0201]  10.2 9.44 0 bottom
R196  100K  [R0201]  41.56 39.31 180 top
R197  47K  [R0201]  25.73 14.6 90 top
R198  47K  [R0201]  25.73 15.66 90 top
R199  1M  [R0201]  89.02 22.35 270 bottom
R200  0R  [R0402]  67.98 48.62 270 bottom
R201  0R  [R0402]  26.35 22.39 90 bottom
R202  0R  [R0402]  22.66 22.39 90 bottom
R203  10K  [R0201]  84.06 37.82 270 top
R204  10K  [R0201]  84.06 36.72 270 top
R205  10K  [R0201]  51.8 5.39 180 top
R206  1M  [R0201]  51.79 4.91 0 top
R207  10K  [R0201]  60.28 5.34 180 top
R208  1M  [R0201]  60.27 4.86 0 top
R209  10K  [R0201]  80.98 5.42 180 top
R210  1M  [R0201]  80.97 4.94 0 top
R211  10K  [R0201]  46.36 5.39 180 top
R212  1M  [R0201]  46.35 4.91 0 top
R213  10K  [R0201]  38.23 5.42 180 top
R214  1M  [R0201]  38.22 4.94 0 top
R215  10K  [R0201]  72.9 5.39 180 top
R216  1M  [R0201]  72.89 4.91 0 top
R217  10K  [R0201]  66.21 48.96 180 bottom
R218  1M  [R0201]  66.2 49.44 0 bottom
R219  10K  [R0201]  43.48 51.32 0 top
R220  1M  [R0201]  43.49 51.8 180 top
R221  10K  [R0201]  49.78 48.94 180 bottom
R222  1M  [R0201]  49.77 49.43 0 bottom
R223  10K  [R0201]  62.03 49 180 bottom
R224  1M  [R0201]  62.02 49.48 0 bottom
R225  1K  [R0201]  18.59 57.4 180 bottom
R226  1M  [R0201]  15.59 42.2 0 bottom
R227  100K  [R0201]  17.32 43.11 90 bottom
R228  0R  [R0402]  43.28 36.53 270 top
R229  0R  [R0402]  40.16 39.72 270 top
R230  0R  [R0402]  21.94 27.27 0 bottom
R231  47K  [R0201]  16.81 14.51 270 top
R232  1K  [R0201]  40.22 41.76 180 top
R233  0R  [R0402]  43.78 33.67 0 top
R234  0R  [R0402]  43.78 32.47 0 top
R235  0R  [R0201]  86.16 34.44 0 top
R236  0R  [R0201]  86.16 33.42 0 top
R237  0R  [R0201]  86.16 32.93 0 top
R238  0R  [R0201]  86.16 31.91 0 top
R239  0R  [R0201]  86.16 31.41 0 top
R240  0R  [R0201]  86.16 30.41 0 top
R241  0R  [R0201]  86.16 29.92 0 top
R242  0R  [R0402]  29.47 36.28 270 bottom
R243  0R  [R0402]  23.36 35.23 90 top
R486  0R  [R0402]  39.2 44.14 90 top
R487  0R  [R0402]  37.93 44.14 90 top
R651  0R  [R0402]  37.72 38.87 90 bottom
R673  100K  [R0201]  38.65 40.49 270 bottom
R751  200R  [R0201]  58.1 43.39 270 bottom
R752  200R  [R0201]  54.66 43.29 180 bottom
R753  200R  [R0201]  58.63 43.94 270 bottom
R754  200R  [R0201]  54.65 44.05 180 bottom
R755  1.62K  [R0201]  54.67 42.78 180 bottom
R800  100K  [R0201]  40.05 40.22 0 bottom
R801  0R  [R0402]  39.37 37.23 0 bottom
R802  0R  [R0402]  39.41 38.44 0 bottom
R803  0R  [R0402]  35.51 23.1 270 top
R804  0R  [R0402]  32.52 16.76 180 top
R806  0R  [R0402]  32.52 15.54 180 top
R807  0R  [R0402]  32.52 17.98 0 top
R808  200K  [R0402]  33 11.77 270 top
R809  0R  [R0402]  32.04 19.72 270 top
R810  100K  [R0201]  32.08 14.62 180 top
R811  100K  [R0201]  33.18 21.34 0 top
R813  100K  [R0201]  33.18 20.57 0 top
R814  100K  [R0201]  44.5 14.84 180 top
R815  100K  [R0201]  33.16 19.39 0 top
R816  100K  [R0201]  43.73 22.59 270 top
R817  100K  [R0201]  33.15 18.81 0 top
SHORT1  -  [SHORT_2MIL]  54.56 41.37 270 top
SHORT2  -  [SHORT_2MIL]  55.45 41.27 270 top
SHORT3  -  [SHORT_2MIL]  53.28 38.33 90 top
SHORT4  -  [SHORT_2MIL]  53.52 39.07 270 top
SHORT5  -  [SHORT_2MIL]  41.81 25.61 180 bottom
SW1  Tactile Switch  [SW_4P]  92.87 15.41 0 bottom
SW2  Tactile Switch  [SW_4P]  92.87 20.19 0 bottom
SW3  Tactile Switch  [SW_4P]  8.02 6.26 180 bottom
SW4  Tactile Switch  [SW_4P]  8.02 15.73 180 bottom
T1  -  [TPAD_020]  31.1 14.16 0 top
T69  -  [TPAD_020]  30.94 15.43 0 top
T71  -  [TPAD_020]  43.01 38.82 0 top
T72  -  [TPAD_020]  40.64 38.3 0 top
T73  -  [TPAD_020]  44.4 35.53 0 top
T74  -  [TPAD_020]  44.4 36.93 0 top
T76  -  [TPAD_020]  45.27 14.85 0 top
T77  -  [TPAD_020]  33.44 20 0 top
T78  -  [TPAD_020]  31.04 18.39 0 top
TP1  -  [TPAD_015]  63.64 36.15 180 bottom
TP2  -  [TPAD_015]  58.91 31.76 180 bottom
TP3  Test Point  [TP35S_SMD]  44.63 25.47 0 top
TP4  Test Point  [TP35S_SMD]  46.35 22.5 0 top
TP5  Test Point  [TP35S_SMD]  34.06 25.53 180 top
TP6  Test Point  [TP35S_SMD]  53.33 23.68 0 bottom
TP7  Test Point  [TP35S_SMD]  48.7 15.97 0 top
TP8  Test Point  [TP35S_SMD]  41.53 8.84 0 top
TP9  Test Point  [TP30C_SMD]  21.95 11.8 0 top
TP10  Test Point  [TP35S_SMD]  39.27 8.83 0 top
TP11  Test Point  [TP35S_SMD]  38.18 8.83 0 top
TP12  Test Point  [TP35S_SMD]  40.36 8.83 0 top
TP13  Test Point  [TP35S_SMD]  47.13 12.97 0 top
TP14  Test Point  [TP35S_SMD]  47.13 11.7 0 top
TP15  Test Point  [TP35S_SMD]  47.13 10.43 0 top
TP16  Test Point  [TP35S_SMD]  44.81 8.83 0 top
TP17  Test Point  [TP35S_SMD]  43.72 8.83 0 top
TP18  Test Point  [TP35S_SMD]  42.63 8.83 0 top
TP19  Test Point  [TP35S_SMD]  37.09 8.83 0 top
TP20  Test Point  [TP30C_SMD]  27.6 27.6 180 bottom
TP21  Test Point  [TP35S_SMD]  43.23 30.8 90 top
TP22  Test Point  [TP35S_SMD]  45.94 31.04 90 top
TP23  -  [TPAD_020]  49.72 33.94 180 bottom
TP24  Test Point  [TP30C_SMD]  41.84 48.5 270 top
TP25  Test Point  [TP30C_SMD]  20.1 50.4 180 bottom
TP26  Test Point  [TP35S_SMD]  36.62 39 0 top
TP27  Test Point  [TP35S_SMD]  36.62 37.46 0 top
TP28  Test Point  [TP35S_SMD]  36.62 35.92 0 top
TP29  Test Point  [TP35S_SMD]  47.24 33.46 0 top
TP30  Test Point  [TP35S_SMD]  38.95 31.17 90 top
TP31  Test Point  [TP35S_SMD]  40.63 31.17 90 top
TP32  Test Point  [TP35S_SMD]  37.92 29.91 0 top
TP33  Test Point  [TP35S_SMD]  35.16 50.14 270 top
TP34  Test Point  [TP35S_SMD]  35.16 48.63 270 top
TP35  Test Point  [TP35S_SMD]  37.85 45.83 0 top
TP36  Test Point  [TP35S_SMD]  39.71 45.83 0 top
TP37  Test Point  [TP30C_SMD]  67.75 12.45 0 bottom
TP38  Test Point  [TP30C_SMD]  70.29 12.45 0 bottom
TP48  Test Point  [TP35S_SMD]  38.51 35.85 90 bottom
TP49  Test Point  [TP35S_SMD]  36.45 36.91 0 bottom
TP50  Test Point  [TP35S_SMD]  77.73 45.69 180 bottom
TP51  Test Point  [TP35S_SMD]  79.53 44.72 180 bottom
TP52  Test Point  [TP35S_SMD]  77.72 49.07 90 bottom
TP53  Test Point  [TP35S_SMD]  77.72 47.81 90 bottom
TP54  Test Point  [TP35S_SMD]  43.12 49.52 0 top
TP55  Test Point  [TP35S_SMD]  39.84 50 0 top
TP56  Test Point  [TP35S_SMD]  70.08 49.27 90 bottom
TP57  Test Point  [TP35S_SMD]  70.08 48.01 90 bottom
TP257  Test Point  [TP35S_SMD]  36.46 38.86 270 bottom
U1  TH1520  [BGA921_0D4_1D480_1W480_T100]  57.37 37.65 0 top
U2  AP6203BM  [MODULE44-0_9-12X12X1_5MM]  27.66 44.74 0 top
U3  EMMC16G-TB29-PZ90  [BGA153_P14_P5_11P5X13]  74.44 20.97 0 bottom
U4  RTL8211F-VD-CG  [QFN40_0D4_5X5MM]  25.58 31.75 0 bottom
U5  ETA6020D2G-T/U  [DFN2X2-6L]  15.49 18.74 0 bottom
U6  ETA3410D2I-T  [DFN8G_0D5_2X2MM_3410]  22.68 16.14 0 top
U7  UM3304  [BGA12_0D5_1_9X1_4X0_68MM]  66.94 5.76 0 top
U8  ETA6020D2G-T/U  [DFN2X2-6L]  93.36 24.34 270 bottom
U9  ETA6020D2G-T/U  [DFN2X2-6L]  87.14 21.96 0 bottom
U10  ATL431AIDBZR  [SOT_23_3]  21.23 39.46 270 bottom
U11  UM3304  [BGA12_0D5_1_9X1_4X0_68MM]  74.86 5.79 0 top
U12  UM3304  [BGA12_0D5_1_9X1_4X0_68MM]  62.52 5.79 0 top
U13  UM3304  [BGA12_0D5_1_9X1_4X0_68MM]  40.19 5.81 0 top
U14  UM3304  [BGA12_0D5_1_9X1_4X0_68MM]  49.72 5.84 0 top
U15  UM3304  [BGA12_0D5_1_9X1_4X0_68MM]  74 48.53 0 bottom
U16  UM3304  [BGA12_0D5_1_9X1_4X0_68MM]  58.25 5.76 0 top
U17  UM3204H  [BGA12_0D5_1_9X1_4X0_68MM]  91.11 41.17 0 top
U18  UM3304  [BGA12_0D5_1_9X1_4X0_68MM]  53 48.57 0 bottom
U19  UM3304  [BGA12_0D5_1_9X1_4X0_68MM]  64.18 48.52 0 bottom
U20  FT24C32A-ELRT  [SOT23-5]  38.57 47.95 270 top
U21  AP2112K-1.8TRG1  [SOT23-5]  27.87 15.95 180 top
U22  UM3204H  [BGA12_0D5_1_9X1_4X0_68MM]  70.82 11.75 0 top
U23  UM3304  [BGA12_0D5_1_9X1_4X0_68MM]  53.82 5.76 0 top
U24  UM3304  [BGA12_0D5_1_9X1_4X0_68MM]  78.96 5.81 0 top
U25  UM3304  [BGA12_0D5_1_9X1_4X0_68MM]  44.32 5.83 0 top
U26  UM3304  [BGA12_0D5_1_9X1_4X0_68MM]  36.19 5.88 0 top
U27  UM3304  [BGA12_0D5_1_9X1_4X0_68MM]  70.86 5.78 0 top
U28  UM3304  [BGA12_0D5_1_9X1_4X0_68MM]  45.27 50.93 180 top
U29  UM3204H  [BGA12_0D5_1_9X1_4X0_68MM]  47.74 48.5 0 bottom
U30  UM3304  [BGA12_0D5_1_9X1_4X0_68MM]  91.13 38.47 0 top
U31  UM3304  [BGA12_0D5_1_9X1_4X0_68MM]  59.99 48.56 0 bottom
U81  DA9063  [BGA100_0D8_D800_W800_T100]  38.74 16.68 90 top
U83  DA9121  [BGA24_0D4_D250_W170_T060]  42.19 39.79 90 bottom
UD1  16Gbit  [FBGA800P10200X14700X1000-200]  73.27 35.65 0 top
UD2  16Gbit  [FBGA800P10200X14700X1000-200]  59.37 21.76 270 top
Y1  32.768kHz 12.5pF  [X2_SMD_3_2X1_5MM]  38.1 39.8 270 top
Y2  24MHz  [X4-SMD-3_2X2_5X1_0MM]  39.98 36.13 0 top
Y3  25MHz 18pF  [X4-SMD-3_2X2_5X1_0MM]  25.03 26.15 180 bottom
Y4  37.4MHz  [X4-SMD-3_2X2_5X1_0MM]  17.04 43.97 180 top
Y8  32.768kHz 12.5pF  [X2_SMD_3_2X1_5MM]  34.42 9.68 0 top

## Library data of the parts
C1-C3 C5 C11 C13 C47 C54 C60 = CC: signal model: DEFAULT_CAPACITOR_4.7e+06pF_1_2
C4 C6 C12 C14 C20 C22 C24 C26-C29 C48-C53 C56-C59 C61 = CC: signal model: DEFAULT_CAPACITOR_100000pF_1_2
C7-C10 C17-C19 C21 C23 C25 C31-C46 C55 C62-C68 C70-C123 C169-C174 C176-C181 C257-C262 C267-C278 C281-C290 C333 C336-C338 C373-C375 C457 C458 C600-C634 C638-C644 C673 C687 C698 C1000-C1015 C1020 C1021 C1023 C1024 C1026-C1031 C1034-C1048 C1051-C1053 C1055-C1057 C1059 C1060 C1062 C1066-C1077 C1083-C1087 C1091-C1093 C1095 C1097 C1098 C1100 C1101 C1103 C1106 C1109-C1111 C1114 C1119 C1120 C1122-C1125 C1127-C1130 C1135-C1138 C1140-C1142 C1144 C1147 C1150 = CC
C15 C16 = CC: signal model: DEFAULT_CAPACITOR_27.000000pF_1_2
C30 = CC: signal model: DEFAULT_CAPACITOR_1000pF_1_2
C69 = CC: signal model: DEFAULT_CAPACITOR_1e+08pF_1_2
C1115-C1118 C1133 C1134 C1151 = CC_EMIFIL_3P
D1 D2 D4 D5 D12 = D_ESD_DIFFPAIR
D3 D9 D13 D24 D28 D32 D35 D38 = D
D6-D8 D10 D11 D14-D22 D25-D27 D29-D31 D33 D34 D36 D37 = DIODE TVS BI-DIR
D23 = D_zener
FB1-FB16 = FB
J1 = Micro HDMI_Type D_19P
J2 = RF ANT 3P
J3-J5 = FPC 22+2P
J6 = USB3_MICRO_B
J7 = Header 2X8 1357
J8 = Power Jack
J9 = Header 2X5_1
J10 = Header 1x6
J14 = RJ45_LPJG0933H11NL
J15 = MicroSD Card_10+4P
L1-L3 L36-L43 = L
L4-L10 = CL
LED1-LED6 = Single LED
MH1-MH4 = Mhole
OSC1 = OSC_4P
P8 P9 = Header 2x23
Q1-Q3 Q7-Q10 Q12-Q14 Q16-Q20 Q26 Q27 = NMOS_123
Q4 = PMOS_123
Q11 = NPN
Q15 Q21 Q22 = PMOS_5P
Q23 Q24 = PNPx2_126_453
R1-R5 R7-R48 R50 R51 R56-R60 R63-R69 R87 R91-R94 R97-R111 R113-R149 R155-R185 R196-R224 R226-R230 R232-R243 R486 R487 R651 R673 R751-R755 R800-R804 R806-R811 R813-R817 = R
R6 R112 = R: signal model: DEFAULT_RESISTOR_0.001OHM_1_2
R49 R52 R61 R62 R74 R78 = R: signal model: R_R0201_DISCRETE_22R_22R
R53-R55 R70-R73 R75-R77 R79 R83-R86 R88 R90 R150 = R: signal model: R_R0201_DISCRETE_33R_33R
R80-R82 R89 R95 R96 = R: signal model: R_R0201_DISCRETE_27R_27R
R151-R154 R231 = R: signal model: DEFAULT_RESISTOR_49900OHM_1_2
R186-R195 R225 = R: signal model: DEFAULT_RESISTOR_1000.000000OHM_1_2
SHORT1-SHORT5 = SHORT_2MIL
SW1-SW4 = Tactile Switch_4P
T1 T69 T71-T74 T76-T78 TP23 = TP20MIL
TP1 TP2 = TEST_POINT_S
TP3-TP22 TP24-TP38 TP48-TP57 TP257 = Test Point
U1 = FM_A_0626
U2 = AP6203BM
U3 = eMMC_1
U4 = RTL8211
U5 U8 U9 = ETA6020D2G
U6 = ETA3410
U7 U11-U19 U22-U31 = UM3304
U10 = TLV431A_1
U20 = MEM_24LC32_SOT23-5
U21 = LDO_5P
U81 = DA9063
U83 = DA9121
UD1 UD2 = LPD4-200BALL
Y1 Y8 = XTAL_2P
Y2-Y4 = XTAL_4P_2

## Footprints (pads in the part's own frame, mm; a bottom-side part is the same pattern mirrored in y, then rotated)
BGA12_0D5_1_9X1_4X0_68MM
  round 0.3 smd: A1(-0.75,0.5) A2(-0.75,0) A3(-0.75,-0.5) B1(-0.25,0.5) B2(-0.25,0) B3(-0.25,-0.5) C1(0.25,0.5) C2(0.25,0) C3(0.25,-0.5) D1(0.75,0.5) D2(0.75,0) D3(0.75,-0.5)
BGA24_0D4_D250_W170_T060
  round 0.23 smd: A1(-1,0.6) A2(-0.6,0.6) A3(-0.2,0.6) A4(0.2,0.6) A5(0.6,0.6) A6(1,0.6) B1(-1,0.2) B2(-0.6,0.2) B3(-0.2,0.2) B4(0.2,0.2) B5(0.6,0.2) B6(1,0.2) C1(-1,-0.2) C2(-0.6,-0.2) C3(-0.2,-0.2) C4(0.2,-0.2) C5(0.6,-0.2) C6(1,-0.2) D1(-1,-0.6) D2(-0.6,-0.6) D3(-0.2,-0.6) D4(0.2,-0.6) D5(0.6,-0.6) D6(1,-0.6)
BGA100_0D8_D800_W800_T100
  round 0.457 smd: A1(-3.6,3.6) A2(-2.8,3.6) A3(-2,3.6) A4(-1.2,3.6) A5(-0.4,3.6) A6(0.4,3.6) A7(1.2,3.6) A8(2,3.6) A9(2.8,3.6) A10(3.6,3.6) B1(-3.6,2.8) B2(-2.8,2.8) B3(-2,2.8) B4(-1.2,2.8) B5(-0.4,2.8) B6(0.4,2.8) B7(1.2,2.8) B8(2,2.8) B9(2.8,2.8) B10(3.6,2.8) C1(-3.6,2) C2(-2.8,2) C3(-2,2) C4(-1.2,2) C5(-0.4,2) C6(0.4,2) C7(1.2,2) C8(2,2) C9(2.8,2) C10(3.6,2) D1(-3.6,1.2) D2(-2.8,1.2) D3(-2,1.2) D4(-1.2,1.2) D5(-0.4,1.2) D6(0.4,1.2) D7(1.2,1.2) D8(2,1.2) D9(2.8,1.2) D10(3.6,1.2) E1(-3.6,0.4) E2(-2.8,0.4) E3(-2,0.4) E4(-1.2,0.4) E5(-0.4,0.4) E6(0.4,0.4) E7(1.2,0.4) E8(2,0.4) E9(2.8,0.4) E10(3.6,0.4) F1(-3.6,-0.4) F2(-2.8,-0.4) F3(-2,-0.4) F4(-1.2,-0.4) F5(-0.4,-0.4) F6(0.4,-0.4) F7(1.2,-0.4) F8(2,-0.4) F9(2.8,-0.4) F10(3.6,-0.4) G1(-3.6,-1.2) G2(-2.8,-1.2) G3(-2,-1.2) G4(-1.2,-1.2) G5(-0.4,-1.2) G6(0.4,-1.2) G7(1.2,-1.2) G8(2,-1.2) G9(2.8,-1.2) G10(3.6,-1.2) H1(-3.6,-2) H2(-2.8,-2) H3(-2,-2) H4(-1.2,-2) H5(-0.4,-2) H6(0.4,-2) H7(1.2,-2) H8(2,-2) H9(2.8,-2) H10(3.6,-2) J1(-3.6,-2.8) J2(-2.8,-2.8) J3(-2,-2.8) J4(-1.2,-2.8) J5(-0.4,-2.8) J6(0.4,-2.8) J7(1.2,-2.8) J8(2,-2.8) J9(2.8,-2.8) J10(3.6,-2.8) K1(-3.6,-3.6) K2(-2.8,-3.6) K3(-2,-3.6) K4(-1.2,-3.6) K5(-0.4,-3.6) K6(0.4,-3.6) K7(1.2,-3.6) K8(2,-3.6) K9(2.8,-3.6) K10(3.6,-3.6)
BGA153_P14_P5_11P5X13
  round 0.254 smd: A1(-3.25,3.25) A2(-2.75,3.25) A3(-2.25,3.25) A4(-1.75,3.25) A5(-1.25,3.25) A6(-0.75,3.25) A7(-0.25,3.25) A8(0.25,3.25) A9(0.75,3.25) A10(1.25,3.25) A11(1.75,3.25) A12(2.25,3.25) A13(2.75,3.25) A14(3.25,3.25) B1(-3.25,2.75) B2(-2.75,2.75) B3(-2.25,2.75) B4(-1.75,2.75) B5(-1.25,2.75) B6(-0.75,2.75) B7(-0.25,2.75) B8(0.25,2.75) B9(0.75,2.75) B10(1.25,2.75) B11(1.75,2.75) B12(2.25,2.75) B13(2.75,2.75) B14(3.25,2.75) C1(-3.25,2.25) C2(-2.75,2.25) C3(-2.25,2.25) C4(-1.75,2.25) C5(-1.25,2.25) C6(-0.75,2.25) C7(-0.25,2.25) C8(0.25,2.25) C9(0.75,2.25) C10(1.25,2.25) C11(1.75,2.25) C12(2.25,2.25) C13(2.75,2.25) C14(3.25,2.25) D1(-3.25,1.75) D2(-2.75,1.75) D3(-2.25,1.75) D4(-1.75,1.75) D12(2.25,1.75) D13(2.75,1.75) D14(3.25,1.75) E1(-3.25,1.25) E2(-2.75,1.25) E3(-2.25,1.25) E5(-1.25,1.25) E6(-0.75,1.25) E7(-0.25,1.25) E8(0.25,1.25) E9(0.75,1.25) E10(1.25,1.25) E12(2.25,1.25) E13(2.75,1.25) E14(3.25,1.25) F1(-3.25,0.75) F2(-2.75,0.75) F3(-2.25,0.75) F5(-1.25,0.75) F10(1.25,0.75) F12(2.25,0.75) F13(2.75,0.75) F14(3.25,0.75) G1(-3.25,0.25) G2(-2.75,0.25) G3(-2.25,0.25) G5(-1.25,0.25) G10(1.25,0.25) G12(2.25,0.25) G13(2.75,0.25) G14(3.25,0.25) H1(-3.25,-0.25) H2(-2.75,-0.25) H3(-2.25,-0.25) H5(-1.25,-0.25) H10(1.25,-0.25) H12(2.25,-0.25) H13(2.75,-0.25) H14(3.25,-0.25) J1(-3.25,-0.75) J2(-2.75,-0.75) J3(-2.25,-0.75) J5(-1.25,-0.75) J10(1.25,-0.75) J12(2.25,-0.75) J13(2.75,-0.75) J14(3.25,-0.75) K1(-3.25,-1.25) K2(-2.75,-1.25) K3(-2.25,-1.25) K5(-1.25,-1.25) K6(-0.75,-1.25) K7(-0.25,-1.25) K8(0.25,-1.25) K9(0.75,-1.25) K10(1.25,-1.25) K12(2.25,-1.25) K13(2.75,-1.25) K14(3.25,-1.25) L1(-3.25,-1.75) L2(-2.75,-1.75) L3(-2.25,-1.75) L12(2.25,-1.75) L13(2.75,-1.75) L14(3.25,-1.75) M1(-3.25,-2.25) M2(-2.75,-2.25) M3(-2.25,-2.25) M4(-1.75,-2.25) M5(-1.25,-2.25) M6(-0.75,-2.25) M7(-0.25,-2.25) M8(0.25,-2.25) M9(0.75,-2.25) M10(1.25,-2.25) M11(1.75,-2.25) M12(2.25,-2.25) M13(2.75,-2.25) M14(3.25,-2.25) N1(-3.25,-2.75) N2(-2.75,-2.75) N3(-2.25,-2.75) N4(-1.75,-2.75) N5(-1.25,-2.75) N6(-0.75,-2.75) N7(-0.25,-2.75) N8(0.25,-2.75) N9(0.75,-2.75) N10(1.25,-2.75) N11(1.75,-2.75) N12(2.25,-2.75) N13(2.75,-2.75) N14(3.25,-2.75) P1(-3.25,-3.25) P2(-2.75,-3.25) P3(-2.25,-3.25) P4(-1.75,-3.25) P5(-1.25,-3.25) P6(-0.75,-3.25) P7(-0.25,-3.25) P8(0.25,-3.25) P9(0.75,-3.25) P10(1.25,-3.25) P11(1.75,-3.25) P12(2.25,-3.25) P13(2.75,-3.25) P14(3.25,-3.25)
BGA921_0D4_1D480_1W480_T100
  custom 0.35x0.25 smd rot 135: A1(-7.228,7.228) AU37(7.228,-7.228)
  custom 0.25x0.35 smd: A2(-6.8,7.24) A36(6.8,7.24) AU2(-6.8,-7.24) AU36(6.8,-7.24)
  round 0.25 smd: A4(-6,7.2) A6(-5.2,7.2) A8(-4.4,7.2) A10(-3.6,7.2) A12(-2.8,7.2) A14(-2,7.2) A17(-0.8,7.2) A19(0,7.2) A21(0.8,7.2) A22(1.2,7.2) A24(2,7.2) A26(2.8,7.2) A28(3.6,7.2) A30(4.4,7.2) A32(5.2,7.2) A34(6,7.2) AA3(-6.4,-0.8) AA4(-6,-0.8) AA5(-5.6,-0.8) AA6(-5.2,-0.8) AA9(-4,-0.8) AA11(-3.2,-0.8) AA13(-2.4,-0.8) AA15(-1.6,-0.8) AA17(-0.8,-0.8) AA19(0,-0.8) AA21(0.8,-0.8) AA23(1.6,-0.8) AA25(2.4,-0.8) AA27(3.2,-0.8) AA29(4,-0.8) AA30(4.4,-0.8) AA31(4.8,-0.8) AA32(5.2,-0.8) AA33(5.6,-0.8) AA34(6,-0.8) AA35(6.4,-0.8) AB1(-7.2,-1.2) AB2(-6.8,-1.2) AB3(-6.4,-1.2) AB4(-6,-1.2) AB5(-5.6,-1.2) AB6(-5.2,-1.2) AB8(-4.4,-1.2) AB10(-3.6,-1.2) AB11(-3.2,-1.2) AB12(-2.8,-1.2) AB14(-2,-1.2) AB15(-1.6,-1.2) AB16(-1.2,-1.2) AB18(-0.4,-1.2) AB20(0.4,-1.2) AB22(1.2,-1.2) AB24(2,-1.2) AB26(2.8,-1.2) AB27(3.2,-1.2) AB28(3.6,-1.2) AB30(4.4,-1.2) AB31(4.8,-1.2) AB32(5.2,-1.2) AB33(5.6,-1.2) AB34(6,-1.2) AB35(6.4,-1.2) AB36(6.8,-1.2) AB37(7.2,-1.2) AC3(-6.4,-1.6) AC4(-6,-1.6) AC5(-5.6,-1.6) AC6(-5.2,-1.6) AC9(-4,-1.6) AC10(-3.6,-1.6) AC11(-3.2,-1.6) AC13(-2.4,-1.6) AC15(-1.6,-1.6) AC17(-0.8,-1.6) AC18(-0.4,-1.6) AC19(0,-1.6) AC21(0.8,-1.6) AC23(1.6,-1.6) AC25(2.4,-1.6) AC27(3.2,-1.6) AC29(4,-1.6) AC30(4.4,-1.6) AC31(4.8,-1.6) AC32(5.2,-1.6) AC33(5.6,-1.6) AC34(6,-1.6) AC35(6.4,-1.6) AD1(-7.2,-2) AD2(-6.8,-2) AD3(-6.4,-2) AD4(-6,-2) AD5(-5.6,-2) AD6(-5.2,-2) AD9(-4,-2) AD10(-3.6,-2) AD12(-2.8,-2) AD14(-2,-2) AD16(-1.2,-2) AD18(-0.4,-2) AD20(0.4,-2) AD22(1.2,-2) AD24(2,-2) AD26(2.8,-2) AD27(3.2,-2) AD28(3.6,-2) AD30(4.4,-2) AD31(4.8,-2) AD32(5.2,-2) AD33(5.6,-2) AD34(6,-2) AD35(6.4,-2) AD36(6.8,-2) AD37(7.2,-2) AE3(-6.4,-2.4) AE4(-6,-2.4) AE5(-5.6,-2.4) AE6(-5.2,-2.4) AE8(-4.4,-2.4) AE9(-4,-2.4) AE11(-3.2,-2.4) AE13(-2.4,-2.4) AE15(-1.6,-2.4) AE16(-1.2,-2.4) AE17(-0.8,-2.4) AE18(-0.4,-2.4) AE19(0,-2.4) AE20(0.4,-2.4) AE21(0.8,-2.4) AE22(1.2,-2.4) AE23(1.6,-2.4) AE24(2,-2.4) AE25(2.4,-2.4) AE26(2.8,-2.4) AE27(3.2,-2.4) AE29(4,-2.4) AE30(4.4,-2.4) AE31(4.8,-2.4) AE32(5.2,-2.4) AE33(5.6,-2.4) AE34(6,-2.4) AE35(6.4,-2.4) AF1(-7.2,-2.8) AF2(-6.8,-2.8) AF3(-6.4,-2.8) AF4(-6,-2.8) AF5(-5.6,-2.8) AF6(-5.2,-2.8) AF8(-4.4,-2.8) AF10(-3.6,-2.8) AF12(-2.8,-2.8) AF13(-2.4,-2.8) AF14(-2,-2.8) AF16(-1.2,-2.8) AF18(-0.4,-2.8) AF20(0.4,-2.8) AF22(1.2,-2.8) AF24(2,-2.8) AF26(2.8,-2.8) AF28(3.6,-2.8) AF30(4.4,-2.8) AF31(4.8,-2.8) AF32(5.2,-2.8) AF33(5.6,-2.8) AF34(6,-2.8) AF35(6.4,-2.8) AF36(6.8,-2.8) AF37(7.2,-2.8) AG3(-6.4,-3.2) AG4(-6,-3.2) AG5(-5.6,-3.2) AG6(-5.2,-3.2) AG9(-4,-3.2) AG11(-3.2,-3.2) AG14(-2,-3.2) AG15(-1.6,-3.2) AG16(-1.2,-3.2) AG17(-0.8,-3.2) AG19(0,-3.2) AG21(0.8,-3.2) AG23(1.6,-3.2) AG25(2.4,-3.2) AG27(3.2,-3.2) AG32(5.2,-3.2) AG33(5.6,-3.2) AG34(6,-3.2) AG35(6.4,-3.2) AH1(-7.2,-3.6) AH2(-6.8,-3.6) AH3(-6.4,-3.6) AH4(-6,-3.6) AH5(-5.6,-3.6) AH6(-5.2,-3.6) AH8(-4.4,-3.6) AH11(-3.2,-3.6) AH12(-2.8,-3.6) AH14(-2,-3.6) AH15(-1.6,-3.6) AH16(-1.2,-3.6) AH17(-0.8,-3.6) AH19(0,-3.6) AH20(0.4,-3.6) AH21(0.8,-3.6) AH22(1.2,-3.6) AH23(1.6,-3.6) AH24(2,-3.6) AH25(2.4,-3.6) AH26(2.8,-3.6) AH27(3.2,-3.6) AH28(3.6,-3.6) AH29(4,-3.6) AH30(4.4,-3.6) AH32(5.2,-3.6) AH33(5.6,-3.6) AH34(6,-3.6) AH35(6.4,-3.6) AH36(6.8,-3.6) AH37(7.2,-3.6) AJ3(-6.4,-4) AJ4(-6,-4) AJ5(-5.6,-4) AJ6(-5.2,-4) AJ18(-0.4,-4) AJ19(0,-4) AJ20(0.4,-4) AJ21(0.8,-4) AJ22(1.2,-4) AJ23(1.6,-4) AJ24(2,-4) AJ25(2.4,-4) AJ26(2.8,-4) AJ27(3.2,-4) AJ28(3.6,-4) AJ29(4,-4) AJ32(5.2,-4) AJ33(5.6,-4) AJ34(6,-4) AJ35(6.4,-4) AJ36(6.8,-4) AK1(-7.2,-4.4) AK2(-6.8,-4.4) AK3(-6.4,-4.4) AK4(-6,-4.4) AK5(-5.6,-4.4) AK6(-5.2,-4.4) AK8(-4.4,-4.4) AK10(-3.6,-4.4) AK12(-2.8,-4.4) AK14(-2,-4.4) AK16(-1.2,-4.4) AK32(5.2,-4.4) AK33(5.6,-4.4) AK34(6,-4.4) AK35(6.4,-4.4) AK36(6.8,-4.4) AK37(7.2,-4.4) AL3(-6.4,-4.8) AL4(-6,-4.8) AL5(-5.6,-4.8) AL6(-5.2,-4.8) AL15(-1.6,-4.8) AL16(-1.2,-4.8) AL19(0,-4.8) AL23(1.6,-4.8) AL25(2.4,-4.8) AL32(5.2,-4.8) AL33(5.6,-4.8) AL34(6,-4.8) AL35(6.4,-4.8) AL36(6.8,-4.8) AM1(-7.2,-5.2) AM2(-6.8,-5.2) AM3(-6.4,-5.2) AM4(-6,-5.2) AM5(-5.6,-5.2) AM6(-5.2,-5.2) AM7(-4.8,-5.2) AM8(-4.4,-5.2) AM9(-4,-5.2) AM10(-3.6,-5.2) AM11(-3.2,-5.2) AM12(-2.8,-5.2) AM13(-2.4,-5.2) AM14(-2,-5.2) AM15(-1.6,-5.2) AM16(-1.2,-5.2) AM17(-0.8,-5.2) AM18(-0.4,-5.2) AM19(0,-5.2) AM20(0.4,-5.2) AM21(0.8,-5.2) AM22(1.2,-5.2) AM23(1.6,-5.2) AM24(2,-5.2) AM25(2.4,-5.2) AM26(2.8,-5.2) AM27(3.2,-5.2) AM28(3.6,-5.2) AM29(4,-5.2) AM30(4.4,-5.2) AM31(4.8,-5.2) AM32(5.2,-5.2) AM33(5.6,-5.2) AM34(6,-5.2) AM35(6.4,-5.2) AM36(6.8,-5.2) AM37(7.2,-5.2) AN3(-6.4,-5.6) AN4(-6,-5.6) AN5(-5.6,-5.6) AN6(-5.2,-5.6) AN7(-4.8,-5.6) AN8(-4.4,-5.6) AN9(-4,-5.6) AN10(-3.6,-5.6) AN11(-3.2,-5.6) AN12(-2.8,-5.6) AN13(-2.4,-5.6) AN14(-2,-5.6) AN15(-1.6,-5.6) AN16(-1.2,-5.6) AN17(-0.8,-5.6) AN18(-0.4,-5.6) AN19(0,-5.6) AN20(0.4,-5.6) AN21(0.8,-5.6) AN22(1.2,-5.6) AN23(1.6,-5.6) AN24(2,-5.6) AN25(2.4,-5.6) AN26(2.8,-5.6) AN27(3.2,-5.6) AN28(3.6,-5.6) AN29(4,-5.6) AN30(4.4,-5.6) AN31(4.8,-5.6) AN32(5.2,-5.6) AN33(5.6,-5.6) AN34(6,-5.6) AN35(6.4,-5.6) AP1(-7.2,-6) AP2(-6.8,-6) AP3(-6.4,-6) AP4(-6,-6) AP5(-5.6,-6) AP6(-5.2,-6) AP7(-4.8,-6) AP8(-4.4,-6) AP9(-4,-6) AP10(-3.6,-6) AP11(-3.2,-6) AP12(-2.8,-6) AP13(-2.4,-6) AP14(-2,-6) AP15(-1.6,-6) AP16(-1.2,-6) AP17(-0.8,-6) AP18(-0.4,-6) AP19(0,-6) AP20(0.4,-6) AP21(0.8,-6) AP22(1.2,-6) AP23(1.6,-6) AP24(2,-6) AP25(2.4,-6) AP26(2.8,-6) AP27(3.2,-6) AP28(3.6,-6) AP29(4,-6) AP30(4.4,-6) AP31(4.8,-6) AP32(5.2,-6) AP33(5.6,-6) AP34(6,-6) AP35(6.4,-6) AP36(6.8,-6) AP37(7.2,-6) AR2(-6.8,-6.4) AR3(-6.4,-6.4) AR4(-6,-6.4) AR5(-5.6,-6.4) AR6(-5.2,-6.4) AR7(-4.8,-6.4) AR8(-4.4,-6.4) AR9(-4,-6.4) AR10(-3.6,-6.4) AR11(-3.2,-6.4) AR12(-2.8,-6.4) AR13(-2.4,-6.4) AR14(-2,-6.4) AR15(-1.6,-6.4) AR16(-1.2,-6.4) AR17(-0.8,-6.4) AR18(-0.4,-6.4) AR19(0,-6.4) AR20(0.4,-6.4) AR21(0.8,-6.4) AR22(1.2,-6.4) AR23(1.6,-6.4) AR24(2,-6.4) AR25(2.4,-6.4) AR26(2.8,-6.4) AR27(3.2,-6.4) AR28(3.6,-6.4) AR29(4,-6.4) AR30(4.4,-6.4) AR31(4.8,-6.4) AR32(5.2,-6.4) AR33(5.6,-6.4) AR34(6,-6.4) AR35(6.4,-6.4) AR36(6.8,-6.4) AT2(-6.8,-6.8) AT3(-6.4,-6.8) AT4(-6,-6.8) AT6(-5.2,-6.8) AT8(-4.4,-6.8) AT10(-3.6,-6.8) AT12(-2.8,-6.8) AT14(-2,-6.8) AT16(-1.2,-6.8) AT18(-0.4,-6.8) AT19(0,-6.8) AT20(0.4,-6.8) AT22(1.2,-6.8) AT24(2,-6.8) AT26(2.8,-6.8) AT28(3.6,-6.8) AT29(4,-6.8) AT30(4.4,-6.8) AT31(4.8,-6.8) AT32(5.2,-6.8) AT34(6,-6.8) AT35(6.4,-6.8) AT36(6.8,-6.8) AU4(-6,-7.2) AU6(-5.2,-7.2) AU8(-4.4,-7.2) AU10(-3.6,-7.2) AU12(-2.8,-7.2) AU14(-2,-7.2) AU16(-1.2,-7.2) AU18(-0.4,-7.2) AU20(0.4,-7.2) AU22(1.2,-7.2) AU24(2,-7.2) AU26(2.8,-7.2) AU28(3.6,-7.2) AU30(4.4,-7.2) AU32(5.2,-7.2) AU34(6,-7.2) B2(-6.8,6.8) B3(-6.4,6.8) B4(-6,6.8) B6(-5.2,6.8) B8(-4.4,6.8) B10(-3.6,6.8) B12(-2.8,6.8) B14(-2,6.8) B15(-1.6,6.8) B17(-0.8,6.8) B19(0,6.8) B21(0.8,6.8) B22(1.2,6.8) B24(2,6.8) B26(2.8,6.8) B28(3.6,6.8) B30(4.4,6.8) B32(5.2,6.8) B34(6,6.8) B35(6.4,6.8) B36(6.8,6.8) C2(-6.8,6.4) C3(-6.4,6.4) C4(-6,6.4) C5(-5.6,6.4) C6(-5.2,6.4) C7(-4.8,6.4) C8(-4.4,6.4) C9(-4,6.4) C10(-3.6,6.4) C11(-3.2,6.4) C12(-2.8,6.4) C13(-2.4,6.4) C14(-2,6.4) C15(-1.6,6.4) C16(-1.2,6.4) C17(-0.8,6.4) C18(-0.4,6.4) C19(0,6.4) C20(0.4,6.4) C21(0.8,6.4) C22(1.2,6.4) C23(1.6,6.4) C24(2,6.4) C26(2.8,6.4) C27(3.2,6.4) C28(3.6,6.4) C29(4,6.4) C30(4.4,6.4) C31(4.8,6.4) C32(5.2,6.4) C33(5.6,6.4) C34(6,6.4) C35(6.4,6.4) C36(6.8,6.4) D1(-7.2,6) D2(-6.8,6) D3(-6.4,6) D4(-6,6) D5(-5.6,6) D6(-5.2,6) D7(-4.8,6) D8(-4.4,6) D9(-4,6) D10(-3.6,6) D11(-3.2,6) D12(-2.8,6) D13(-2.4,6) D14(-2,6) D15(-1.6,6) D16(-1.2,6) D17(-0.8,6) D18(-0.4,6) D19(0,6) D20(0.4,6) D21(0.8,6) D22(1.2,6) D23(1.6,6) D24(2,6) D25(2.4,6) D26(2.8,6) D27(3.2,6) D28(3.6,6) D29(4,6) D30(4.4,6) D31(4.8,6) D32(5.2,6) D33(5.6,6) D34(6,6) D35(6.4,6) D36(6.8,6) D37(7.2,6) E3(-6.4,5.6) E4(-6,5.6) E5(-5.6,5.6) E6(-5.2,5.6) E7(-4.8,5.6) E8(-4.4,5.6) E9(-4,5.6) E10(-3.6,5.6) E11(-3.2,5.6) E12(-2.8,5.6) E13(-2.4,5.6) E14(-2,5.6) E15(-1.6,5.6) E16(-1.2,5.6) E17(-0.8,5.6) E18(-0.4,5.6) E19(0,5.6) E20(0.4,5.6) E21(0.8,5.6) E22(1.2,5.6) E23(1.6,5.6) E24(2,5.6) E25(2.4,5.6) E26(2.8,5.6) E27(3.2,5.6) E28(3.6,5.6) E29(4,5.6) E30(4.4,5.6) E31(4.8,5.6) E32(5.2,5.6) E33(5.6,5.6) E34(6,5.6) E35(6.4,5.6) F1(-7.2,5.2) F2(-6.8,5.2) F3(-6.4,5.2) F4(-6,5.2) F5(-5.6,5.2) F6(-5.2,5.2) F7(-4.8,5.2) F8(-4.4,5.2) F9(-4,5.2) F10(-3.6,5.2) F11(-3.2,5.2) F12(-2.8,5.2) F13(-2.4,5.2) F14(-2,5.2) F15(-1.6,5.2) F16(-1.2,5.2) F17(-0.8,5.2) F18(-0.4,5.2) F19(0,5.2) F20(0.4,5.2) F21(0.8,5.2) F22(1.2,5.2) F23(1.6,5.2) F24(2,5.2) F25(2.4,5.2) F26(2.8,5.2) F27(3.2,5.2) F28(3.6,5.2) F29(4,5.2) F30(4.4,5.2) F31(4.8,5.2) F32(5.2,5.2) F33(5.6,5.2) F34(6,5.2) F35(6.4,5.2) F36(6.8,5.2) F37(7.2,5.2) G3(-6.4,4.8) G4(-6,4.8) G5(-5.6,4.8) G6(-5.2,4.8) G32(5.2,4.8) G33(5.6,4.8) G34(6,4.8) G35(6.4,4.8) H1(-7.2,4.4) H2(-6.8,4.4) H3(-6.4,4.4) H4(-6,4.4) H5(-5.6,4.4) H6(-5.2,4.4) H8(-4.4,4.4) H10(-3.6,4.4) H12(-2.8,4.4) H14(-2,4.4) H16(-1.2,4.4) H18(-0.4,4.4) H20(0.4,4.4) H22(1.2,4.4) H24(2,4.4) H26(2.8,4.4) H28(3.6,4.4) H30(4.4,4.4) H32(5.2,4.4) H33(5.6,4.4) H34(6,4.4) H35(6.4,4.4) H36(6.8,4.4) H37(7.2,4.4) J3(-6.4,4) J4(-6,4) J5(-5.6,4) J6(-5.2,4) J32(5.2,4) J33(5.6,4) J34(6,4) J35(6.4,4) K1(-7.2,3.6) K2(-6.8,3.6) K3(-6.4,3.6) K4(-6,3.6) K5(-5.6,3.6) K6(-5.2,3.6) K8(-4.4,3.6) K10(-3.6,3.6) K12(-2.8,3.6) K14(-2,3.6) K16(-1.2,3.6) K18(-0.4,3.6) K20(0.4,3.6) K22(1.2,3.6) K24(2,3.6) K26(2.8,3.6) K28(3.6,3.6) K30(4.4,3.6) K32(5.2,3.6) K33(5.6,3.6) K34(6,3.6) K35(6.4,3.6) K36(6.8,3.6) K37(7.2,3.6) L3(-6.4,3.2) L4(-6,3.2) L5(-5.6,3.2) L6(-5.2,3.2) L9(-4,3.2) L11(-3.2,3.2) L13(-2.4,3.2) L14(-2,3.2) L15(-1.6,3.2) L16(-1.2,3.2) L17(-0.8,3.2) L18(-0.4,3.2) L19(0,3.2) L20(0.4,3.2) L21(0.8,3.2) L23(1.6,3.2) L25(2.4,3.2) L27(3.2,3.2) L29(4,3.2) L32(5.2,3.2) L33(5.6,3.2) L34(6,3.2) L35(6.4,3.2) M1(-7.2,2.8) M2(-6.8,2.8) M3(-6.4,2.8) M4(-6,2.8) M5(-5.6,2.8) M6(-5.2,2.8) M8(-4.4,2.8) M10(-3.6,2.8) M12(-2.8,2.8) M14(-2,2.8) M16(-1.2,2.8) M18(-0.4,2.8) M20(0.4,2.8) M22(1.2,2.8) M24(2,2.8) M26(2.8,2.8) M28(3.6,2.8) M30(4.4,2.8) M32(5.2,2.8) M33(5.6,2.8) M34(6,2.8) M35(6.4,2.8) M36(6.8,2.8) M37(7.2,2.8) N3(-6.4,2.4) N4(-6,2.4) N5(-5.6,2.4) N6(-5.2,2.4) N9(-4,2.4) N11(-3.2,2.4) N13(-2.4,2.4) N15(-1.6,2.4) N17(-0.8,2.4) N19(0,2.4) N21(0.8,2.4) N23(1.6,2.4) N25(2.4,2.4) N27(3.2,2.4) N29(4,2.4) N32(5.2,2.4) N33(5.6,2.4) N34(6,2.4) N35(6.4,2.4) P1(-7.2,2) P2(-6.8,2) P3(-6.4,2) P4(-6,2) P5(-5.6,2) P6(-5.2,2) P8(-4.4,2) P10(-3.6,2) P12(-2.8,2) P14(-2,2) P16(-1.2,2) P18(-0.4,2) P20(0.4,2) P22(1.2,2) P24(2,2) P26(2.8,2) P27(3.2,2) P28(3.6,2) P30(4.4,2) P32(5.2,2) P33(5.6,2) P34(6,2) P35(6.4,2) P36(6.8,2) P37(7.2,2) R3(-6.4,1.6) R4(-6,1.6) R5(-5.6,1.6) R6(-5.2,1.6) R9(-4,1.6) R11(-3.2,1.6) R13(-2.4,1.6) R15(-1.6,1.6) R17(-0.8,1.6) R19(0,1.6) R21(0.8,1.6) R23(1.6,1.6) R25(2.4,1.6) R27(3.2,1.6) R29(4,1.6) R30(4.4,1.6) R31(4.8,1.6) R32(5.2,1.6) R33(5.6,1.6) R34(6,1.6) R35(6.4,1.6) T1(-7.2,1.2) T2(-6.8,1.2) T3(-6.4,1.2) T4(-6,1.2) T5(-5.6,1.2) T6(-5.2,1.2) T8(-4.4,1.2) T10(-3.6,1.2) T12(-2.8,1.2) T14(-2,1.2) T16(-1.2,1.2) T18(-0.4,1.2) T20(0.4,1.2) T22(1.2,1.2) T24(2,1.2) T26(2.8,1.2) T27(3.2,1.2) T28(3.6,1.2) T30(4.4,1.2) T31(4.8,1.2) T32(5.2,1.2) T33(5.6,1.2) T34(6,1.2) T35(6.4,1.2) T36(6.8,1.2) T37(7.2,1.2) U3(-6.4,0.8) U4(-6,0.8) U5(-5.6,0.8) U6(-5.2,0.8) U9(-4,0.8) U11(-3.2,0.8) U13(-2.4,0.8) U15(-1.6,0.8) U17(-0.8,0.8) U19(0,0.8) U21(0.8,0.8) U23(1.6,0.8) U25(2.4,0.8) U27(3.2,0.8) U29(4,0.8) U30(4.4,0.8) U31(4.8,0.8) U32(5.2,0.8) U33(5.6,0.8) U34(6,0.8) U35(6.4,0.8) V1(-7.2,0.4) V2(-6.8,0.4) V3(-6.4,0.4) V4(-6,0.4) V5(-5.6,0.4) V6(-5.2,0.4) V8(-4.4,0.4) V10(-3.6,0.4) V12(-2.8,0.4) V14(-2,0.4) V15(-1.6,0.4) V16(-1.2,0.4) V18(-0.4,0.4) V20(0.4,0.4) V22(1.2,0.4) V24(2,0.4) V26(2.8,0.4) V27(3.2,0.4) V28(3.6,0.4) V30(4.4,0.4) V31(4.8,0.4) V32(5.2,0.4) V33(5.6,0.4) V34(6,0.4) V35(6.4,0.4) V36(6.8,0.4) V37(7.2,0.4) W3(-6.4,0) W4(-6,0) W5(-5.6,0) W6(-5.2,0) W9(-4,0) W11(-3.2,0) W13(-2.4,0) W15(-1.6,0) W17(-0.8,0) W19(0,0) W21(0.8,0) W23(1.6,0) W25(2.4,0) W27(3.2,0) W29(4,0) W31(4.8,0) W32(5.2,0) W33(5.6,0) W34(6,0) W35(6.4,0) W36(6.8,0) Y1(-7.2,-0.4) Y2(-6.8,-0.4) Y3(-6.4,-0.4) Y4(-6,-0.4) Y5(-5.6,-0.4) Y6(-5.2,-0.4) Y8(-4.4,-0.4) Y10(-3.6,-0.4) Y12(-2.8,-0.4) Y14(-2,-0.4) Y16(-1.2,-0.4) Y18(-0.4,-0.4) Y20(0.4,-0.4) Y22(1.2,-0.4) Y24(2,-0.4) Y26(2.8,-0.4) Y27(3.2,-0.4) Y28(3.6,-0.4) Y30(4.4,-0.4) Y32(5.2,-0.4) Y33(5.6,-0.4) Y34(6,-0.4) Y35(6.4,-0.4) Y36(6.8,-0.4) Y37(7.2,-0.4)
  custom 0.35x0.25 smd rot 45: A37(7.228,7.228) AU1(-7.228,-7.228)
  custom 0.35x0.25 smd: AT1(-7.24,-6.8) AT37(7.24,-6.8) B1(-7.24,6.8) B37(7.24,6.8)
